# Altium PCB Copy of Motor Controller.PcbDoc (part 1 of 3)
Units mm, origin at the board's own origin, x right, y up, seen from the top; angles counter-clockwise.
Board outline 52 x 52 mm, 6 copper layers (Signal 1, GND1, Signal 2, Power, GND2, Signal 3), stack 1.816 mm thick; 182 components, 97 nets, 695 pads, 1437 vias.
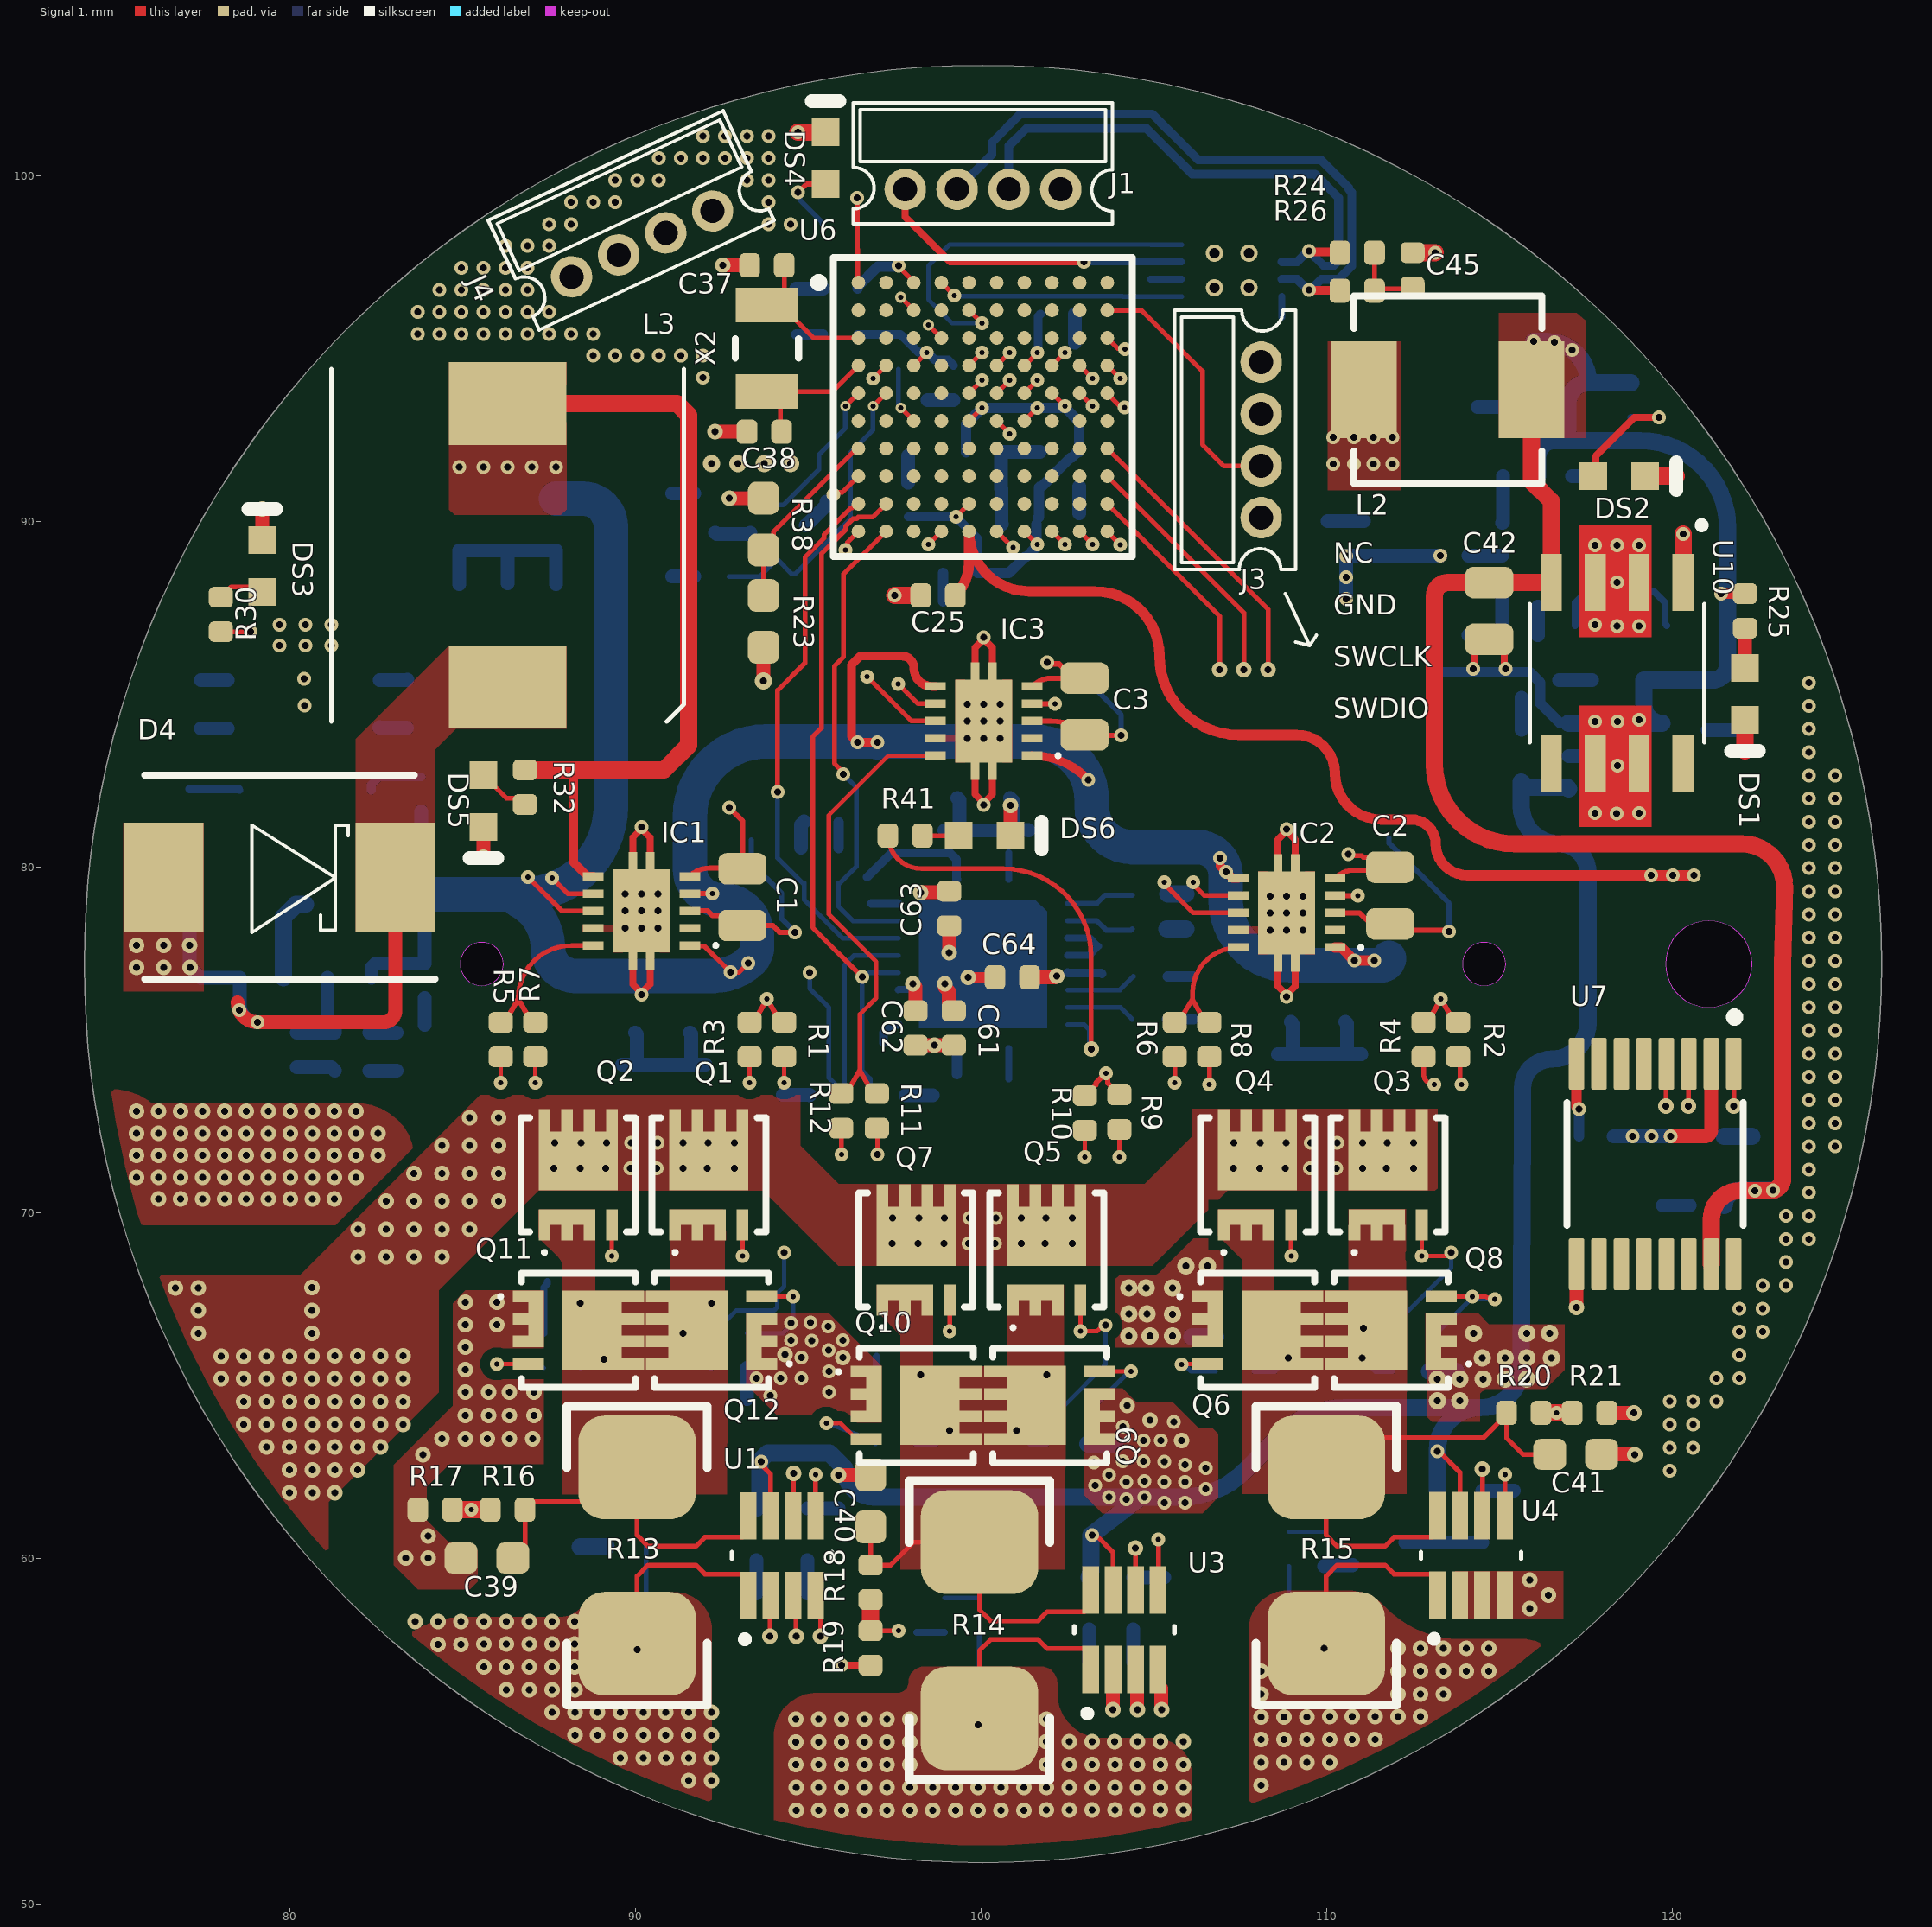
[diagram p0: Signal 1 view]
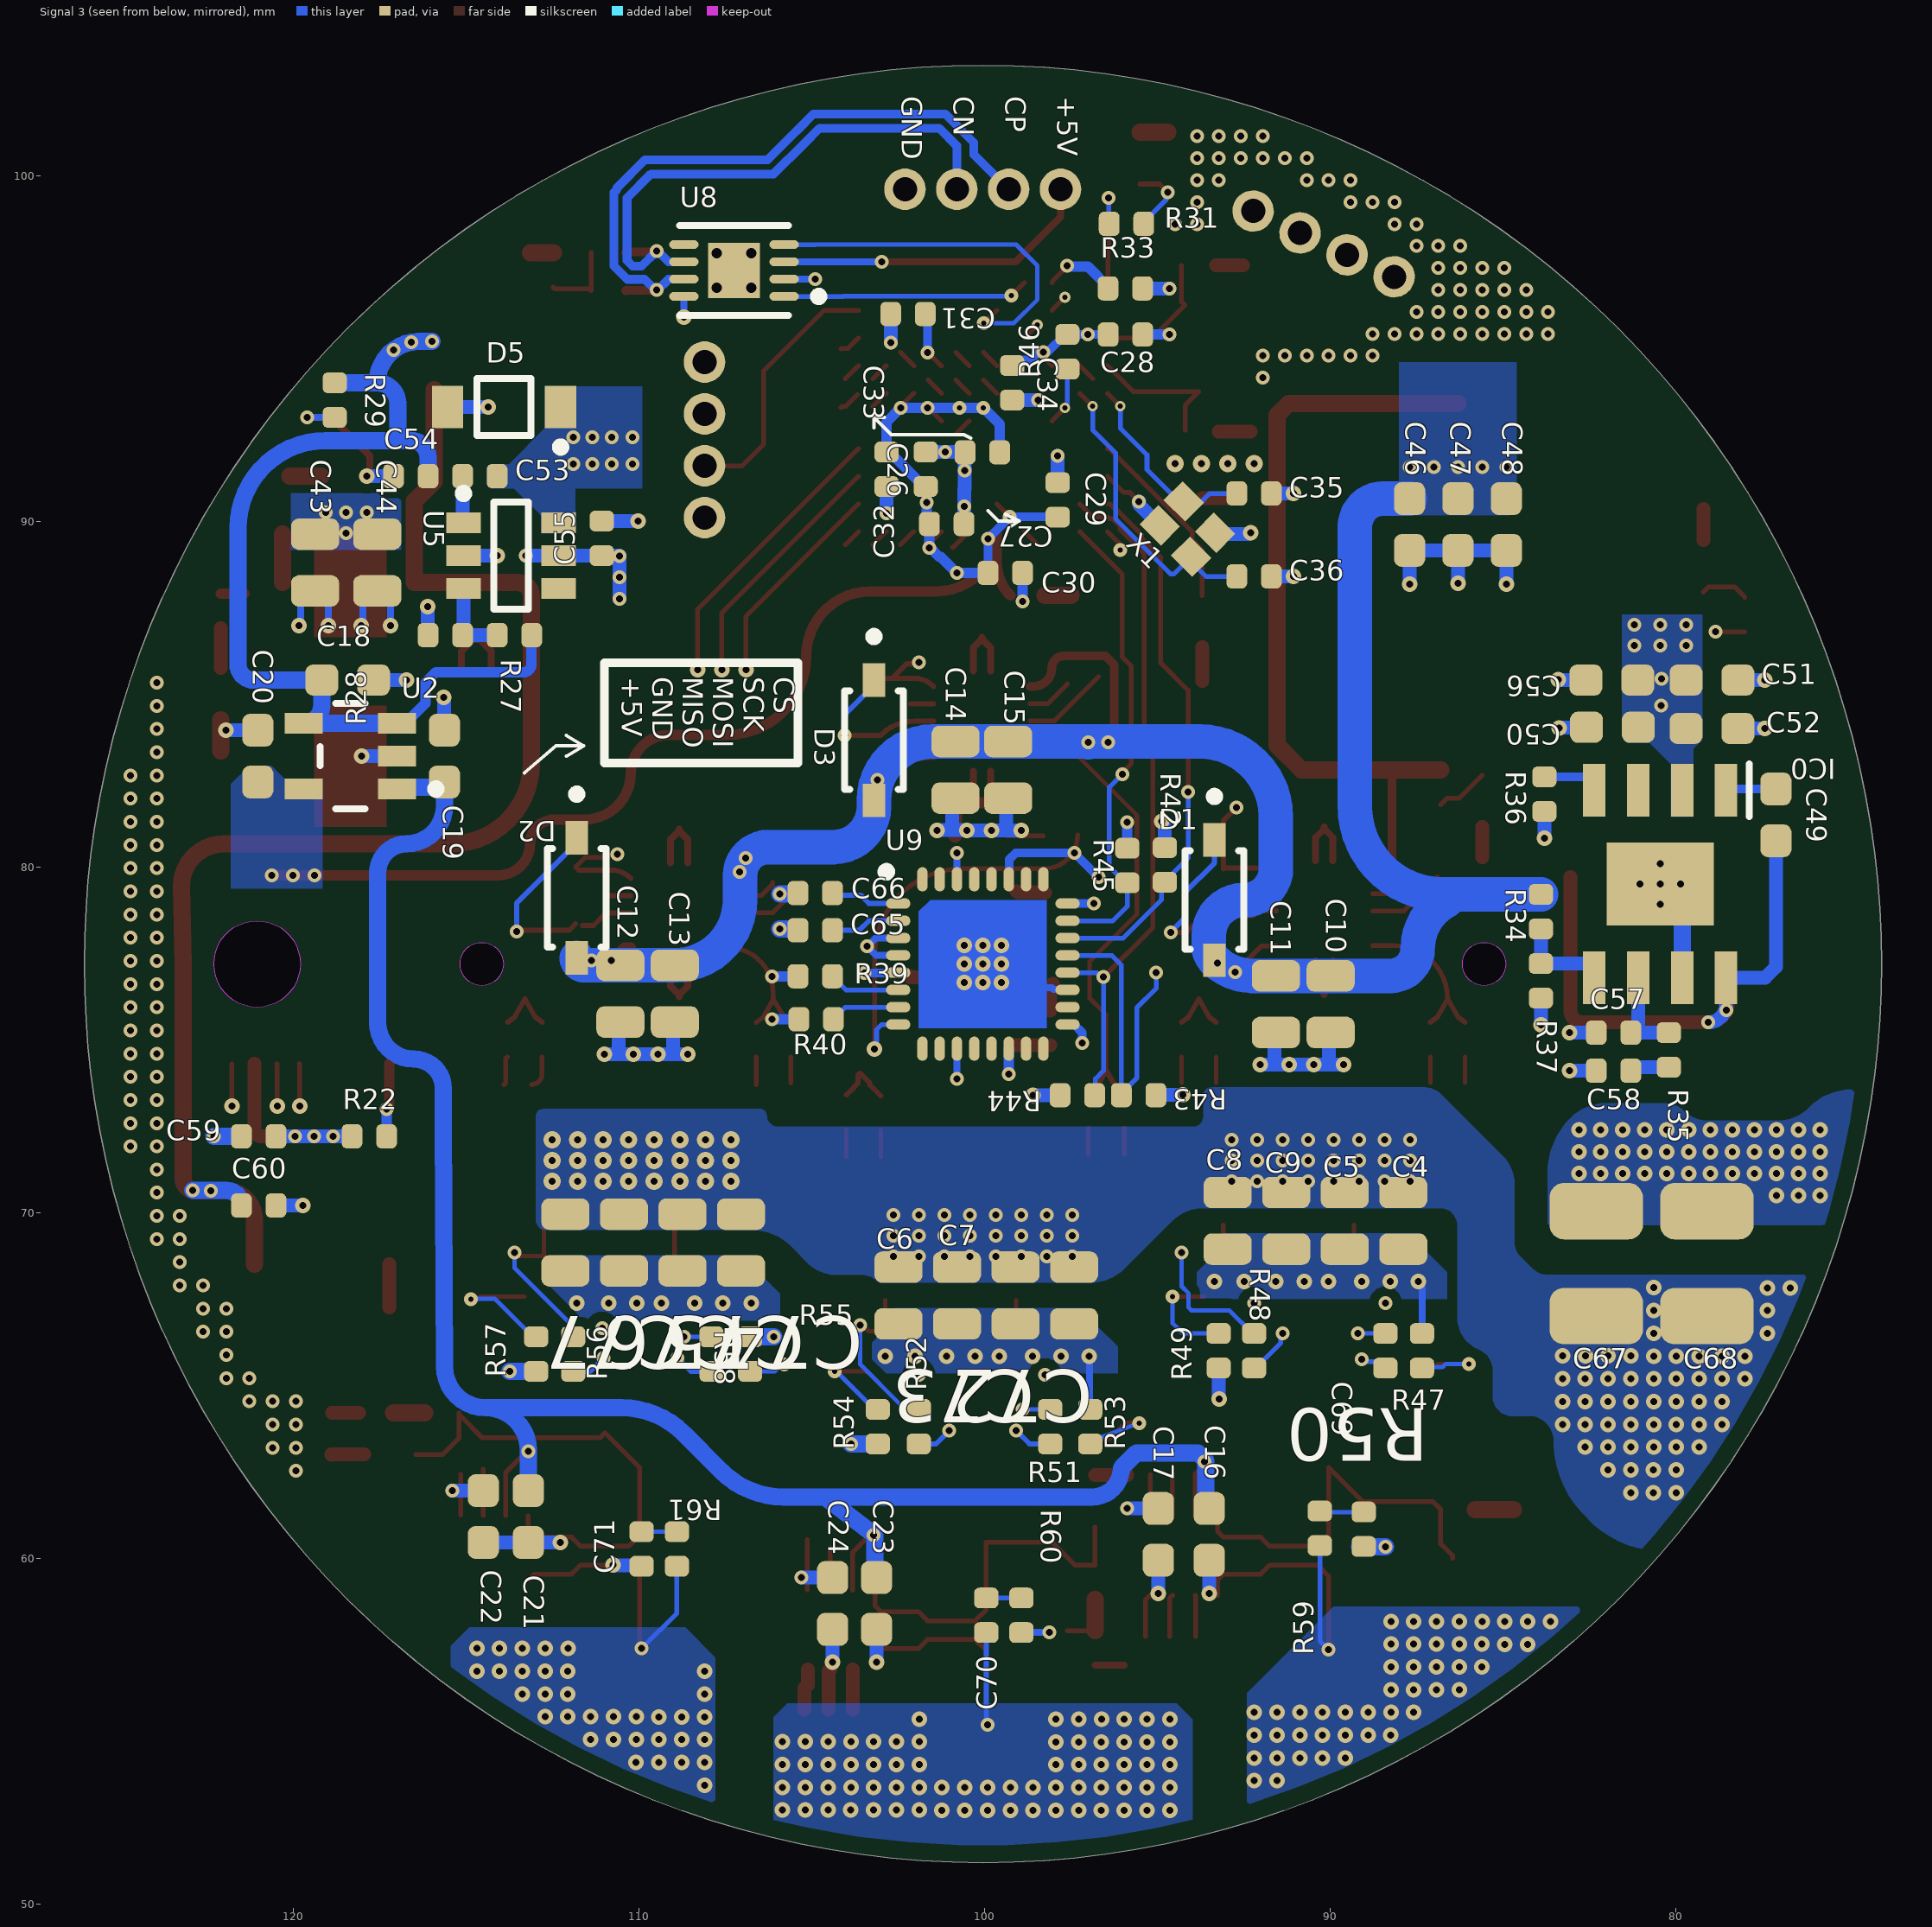
[diagram p1: Signal 3 view, seen from below]
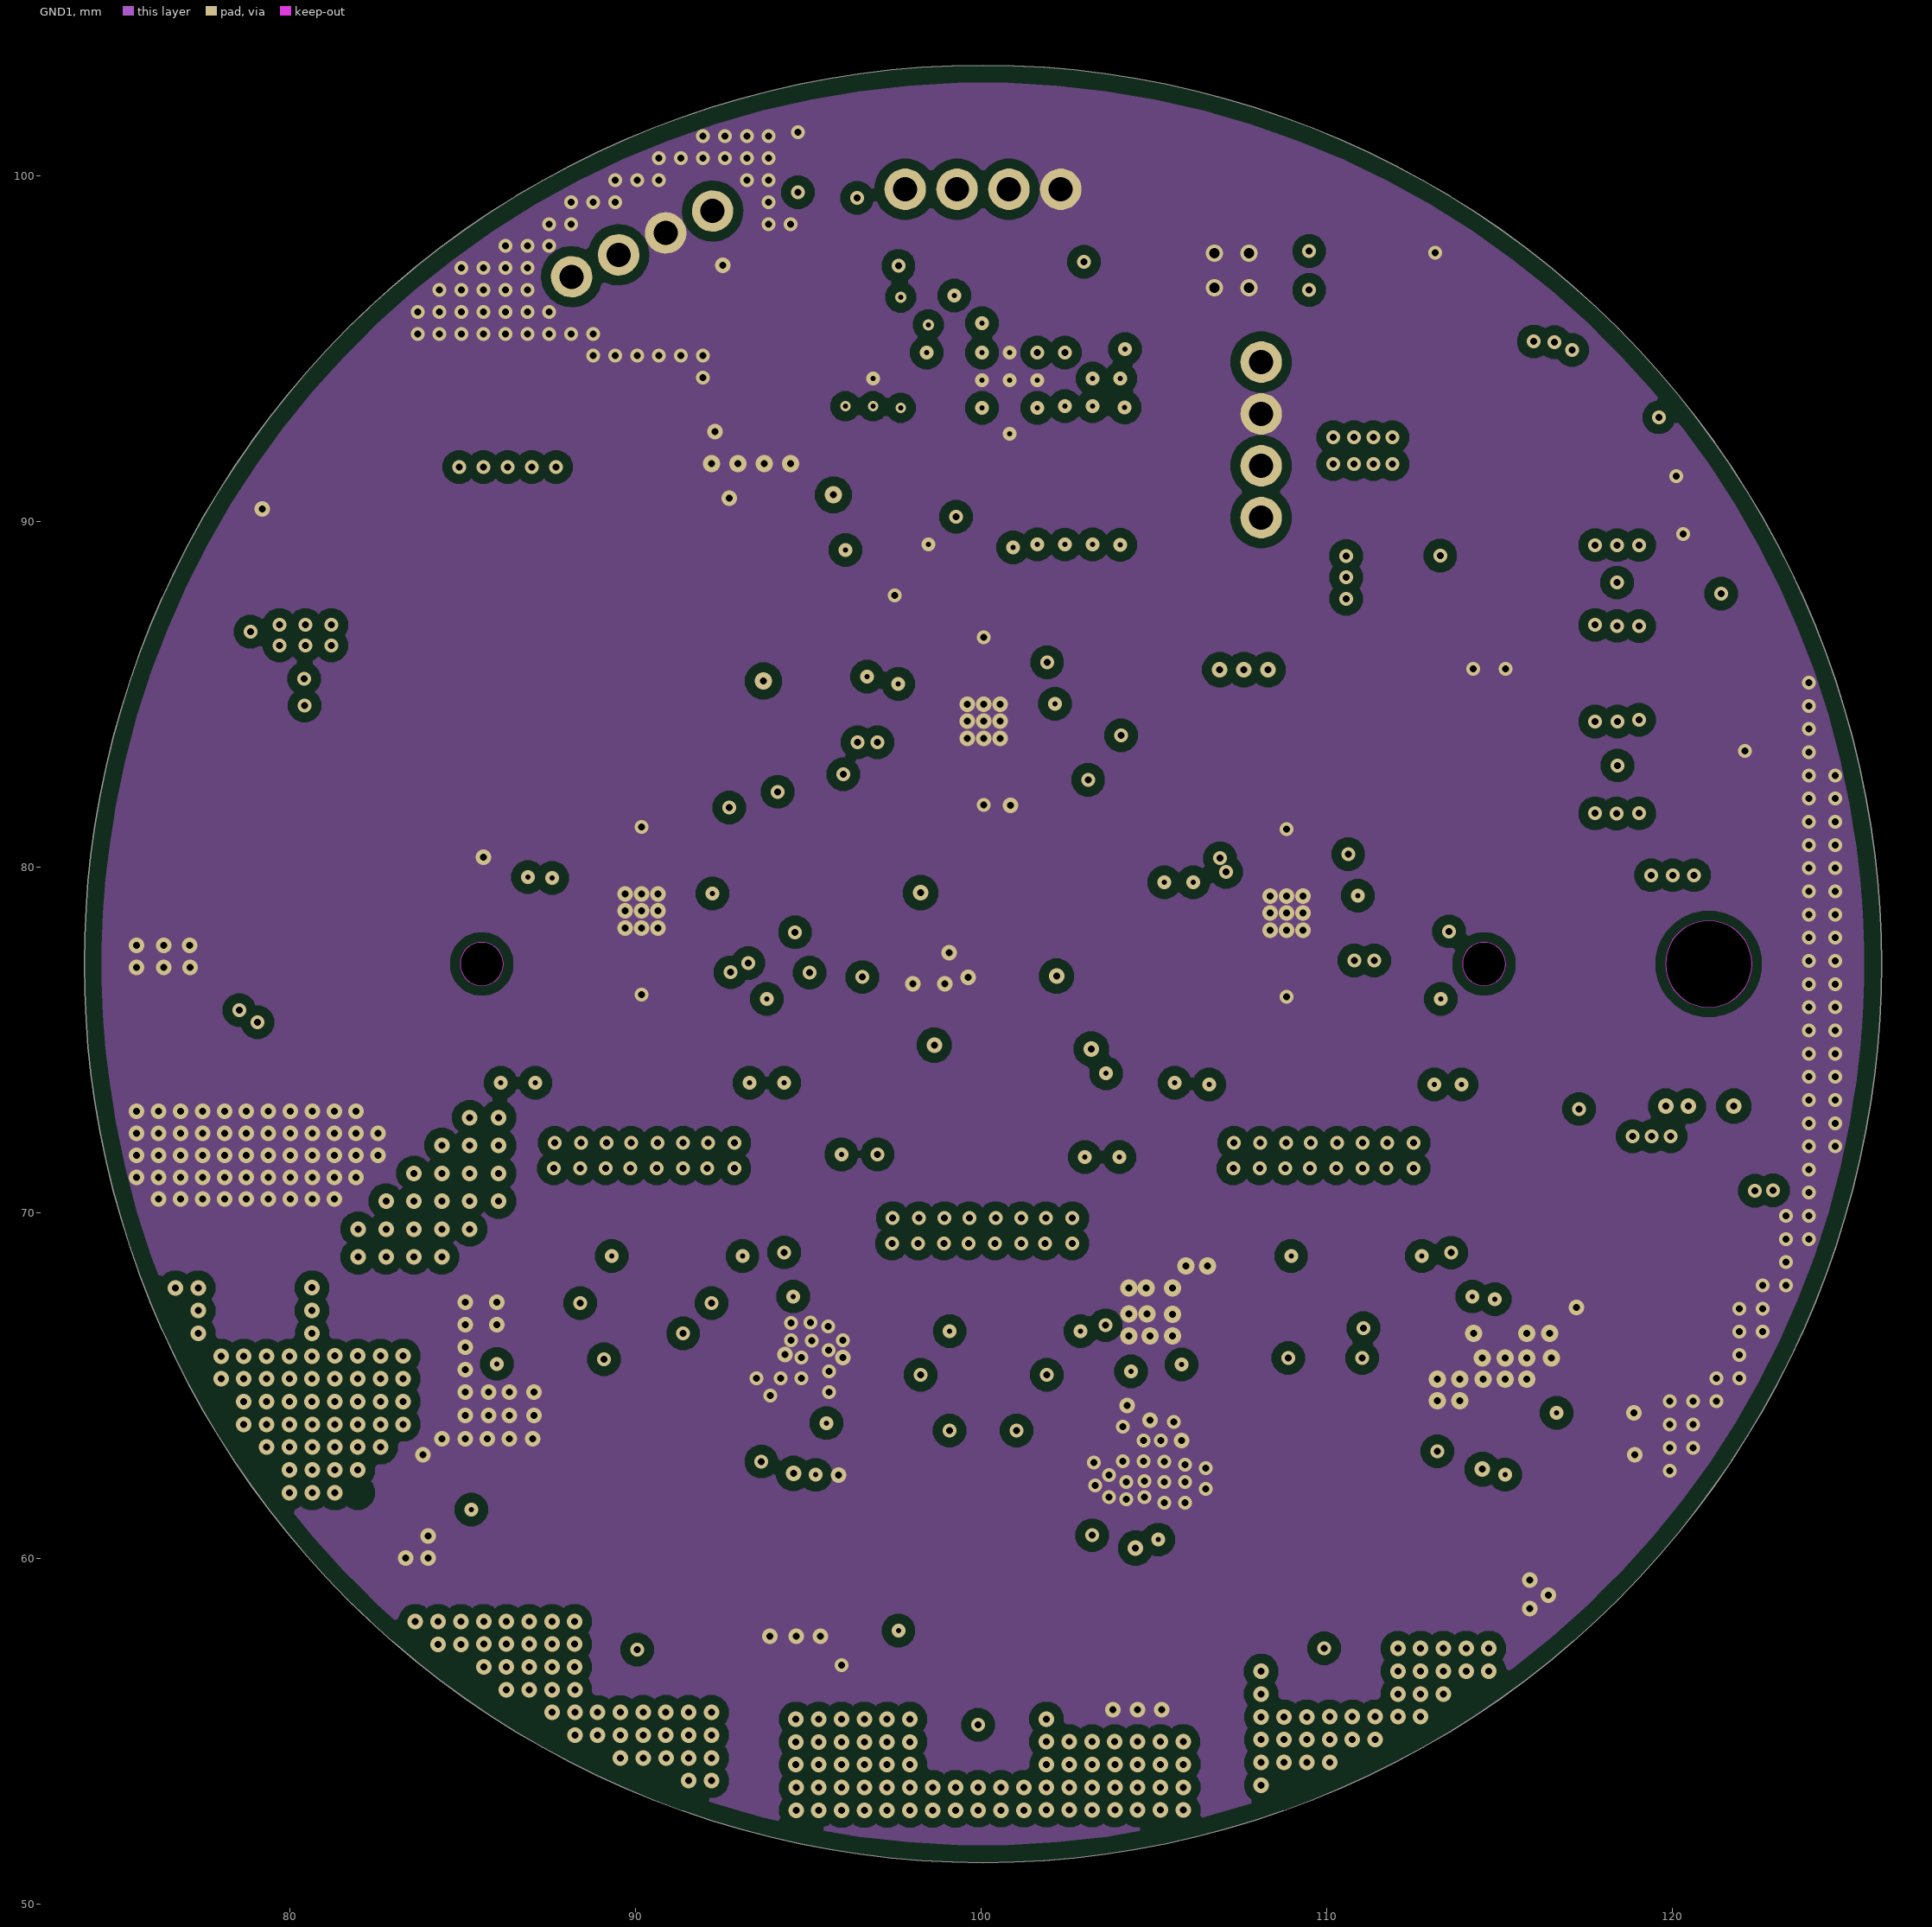
[diagram p2: GND1]
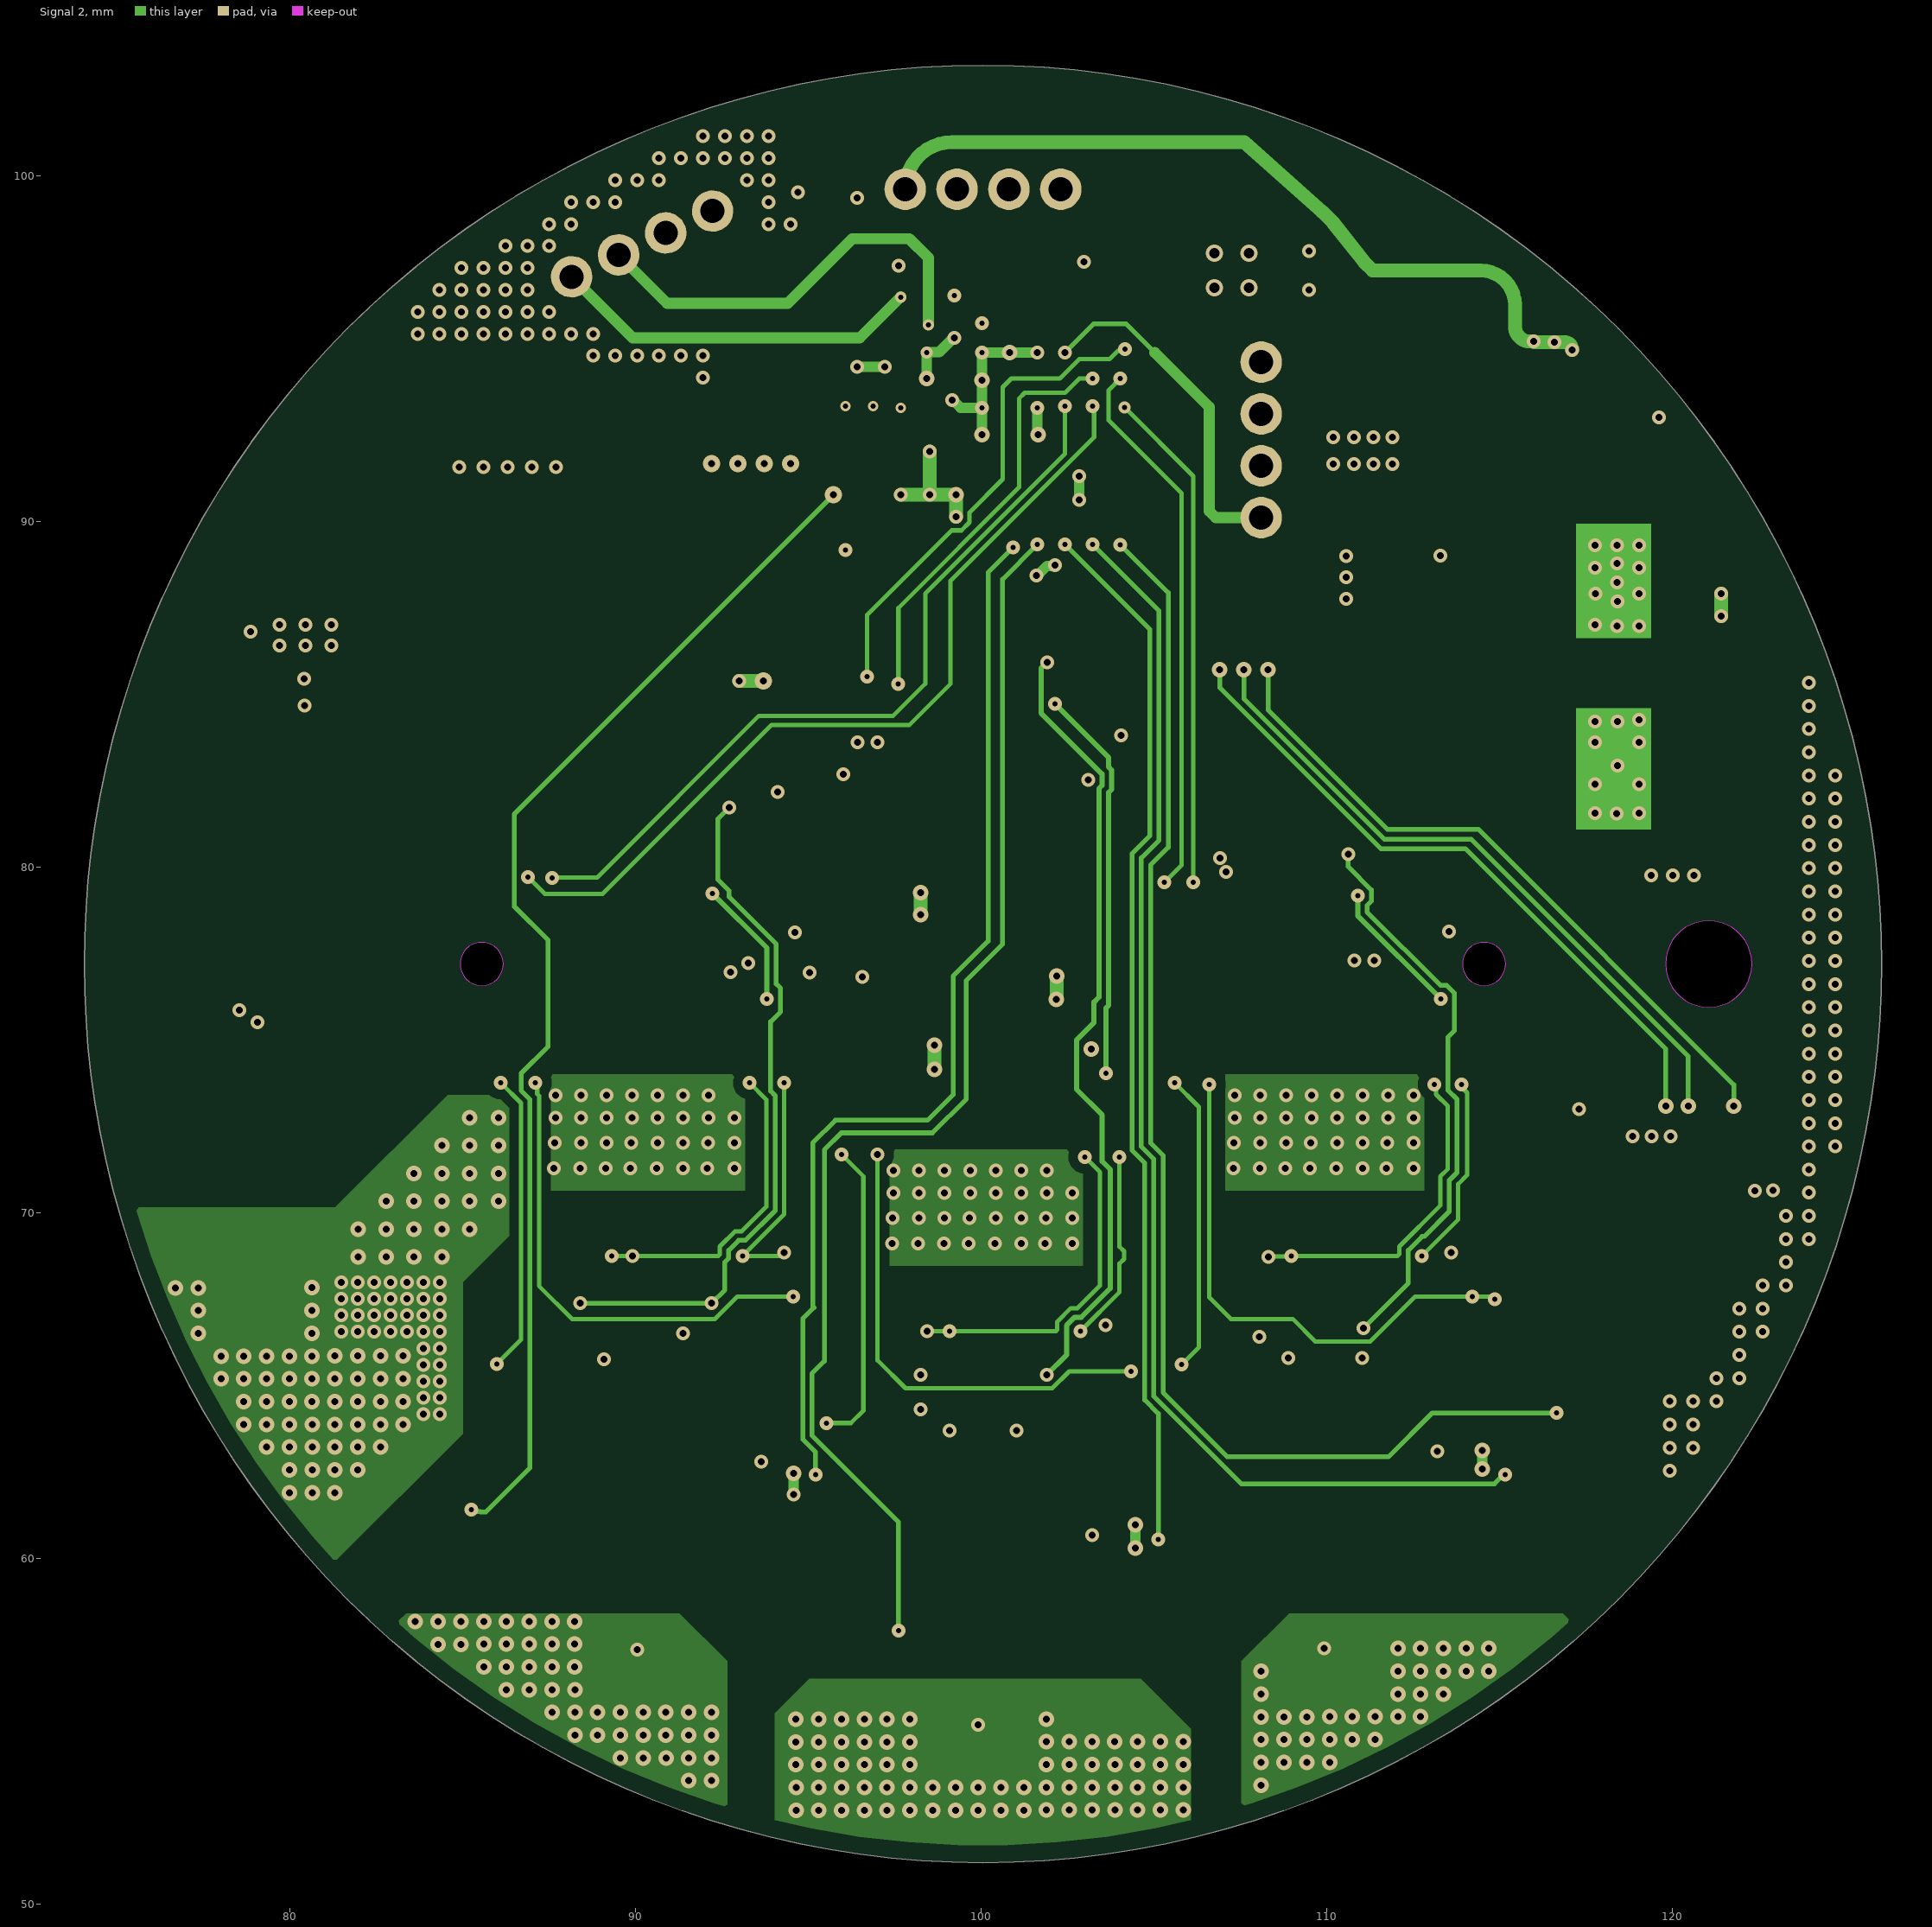
[diagram p3: Signal 2]
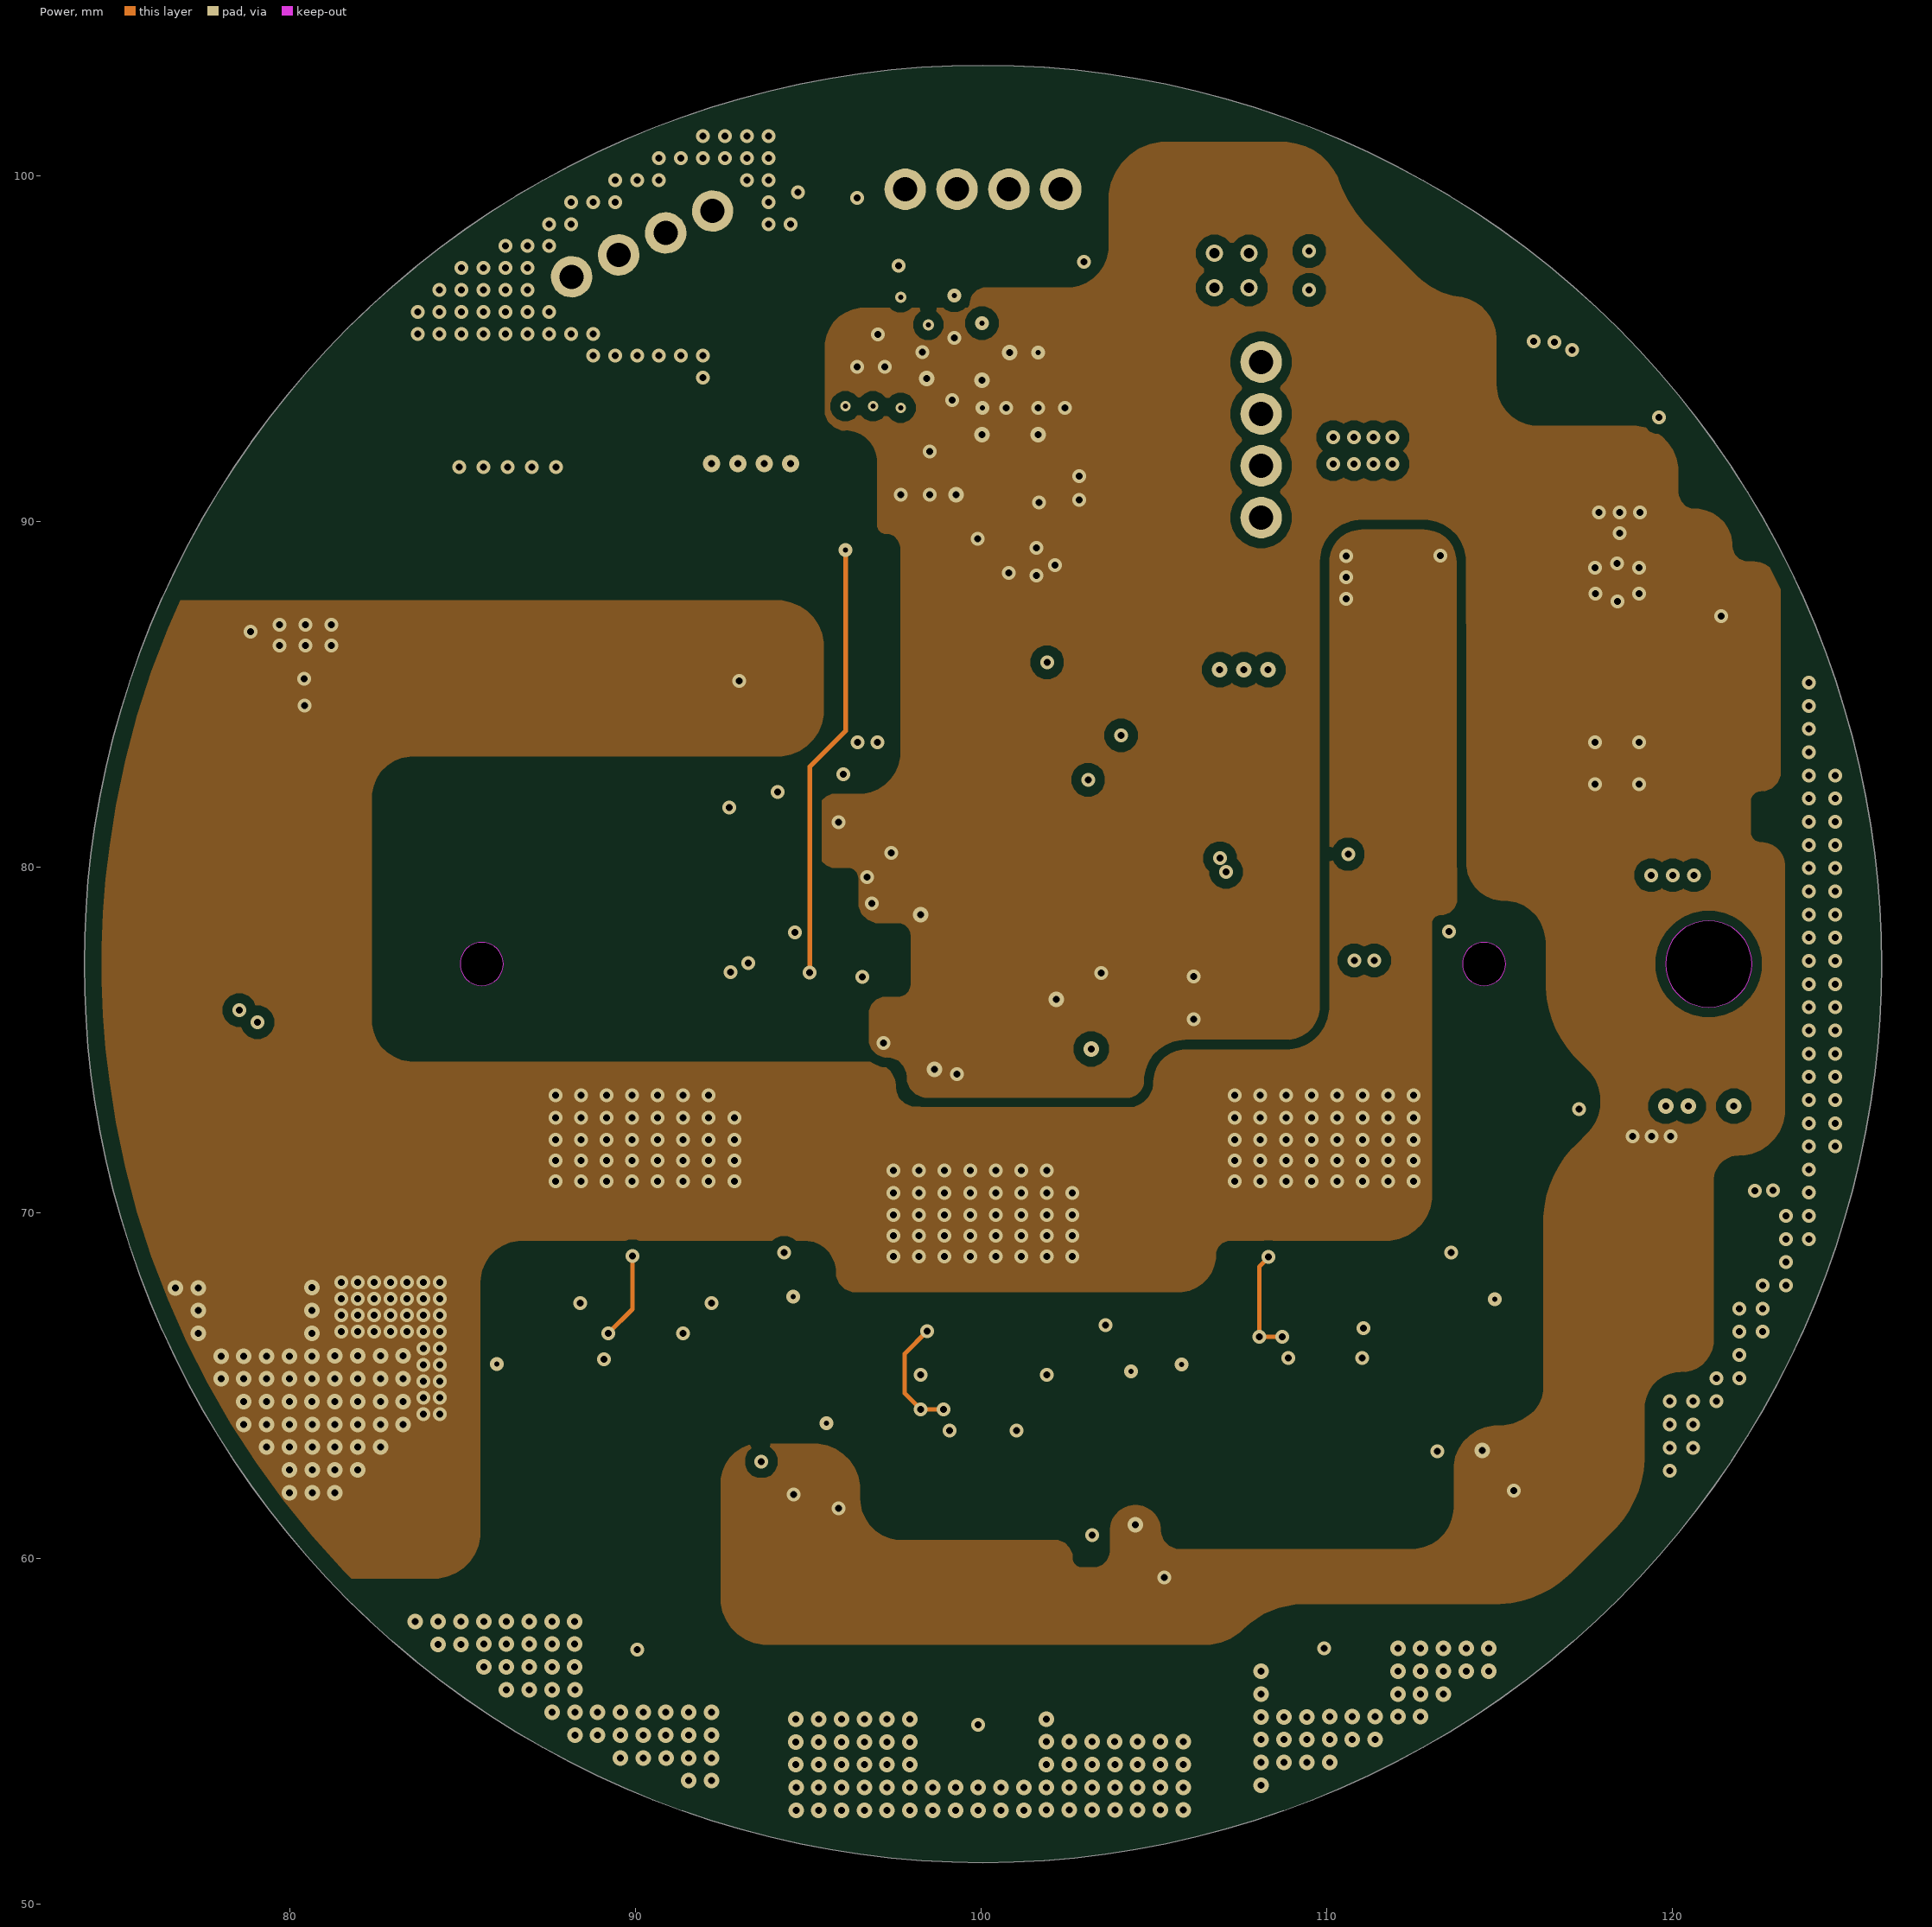
[diagram p4: Power]
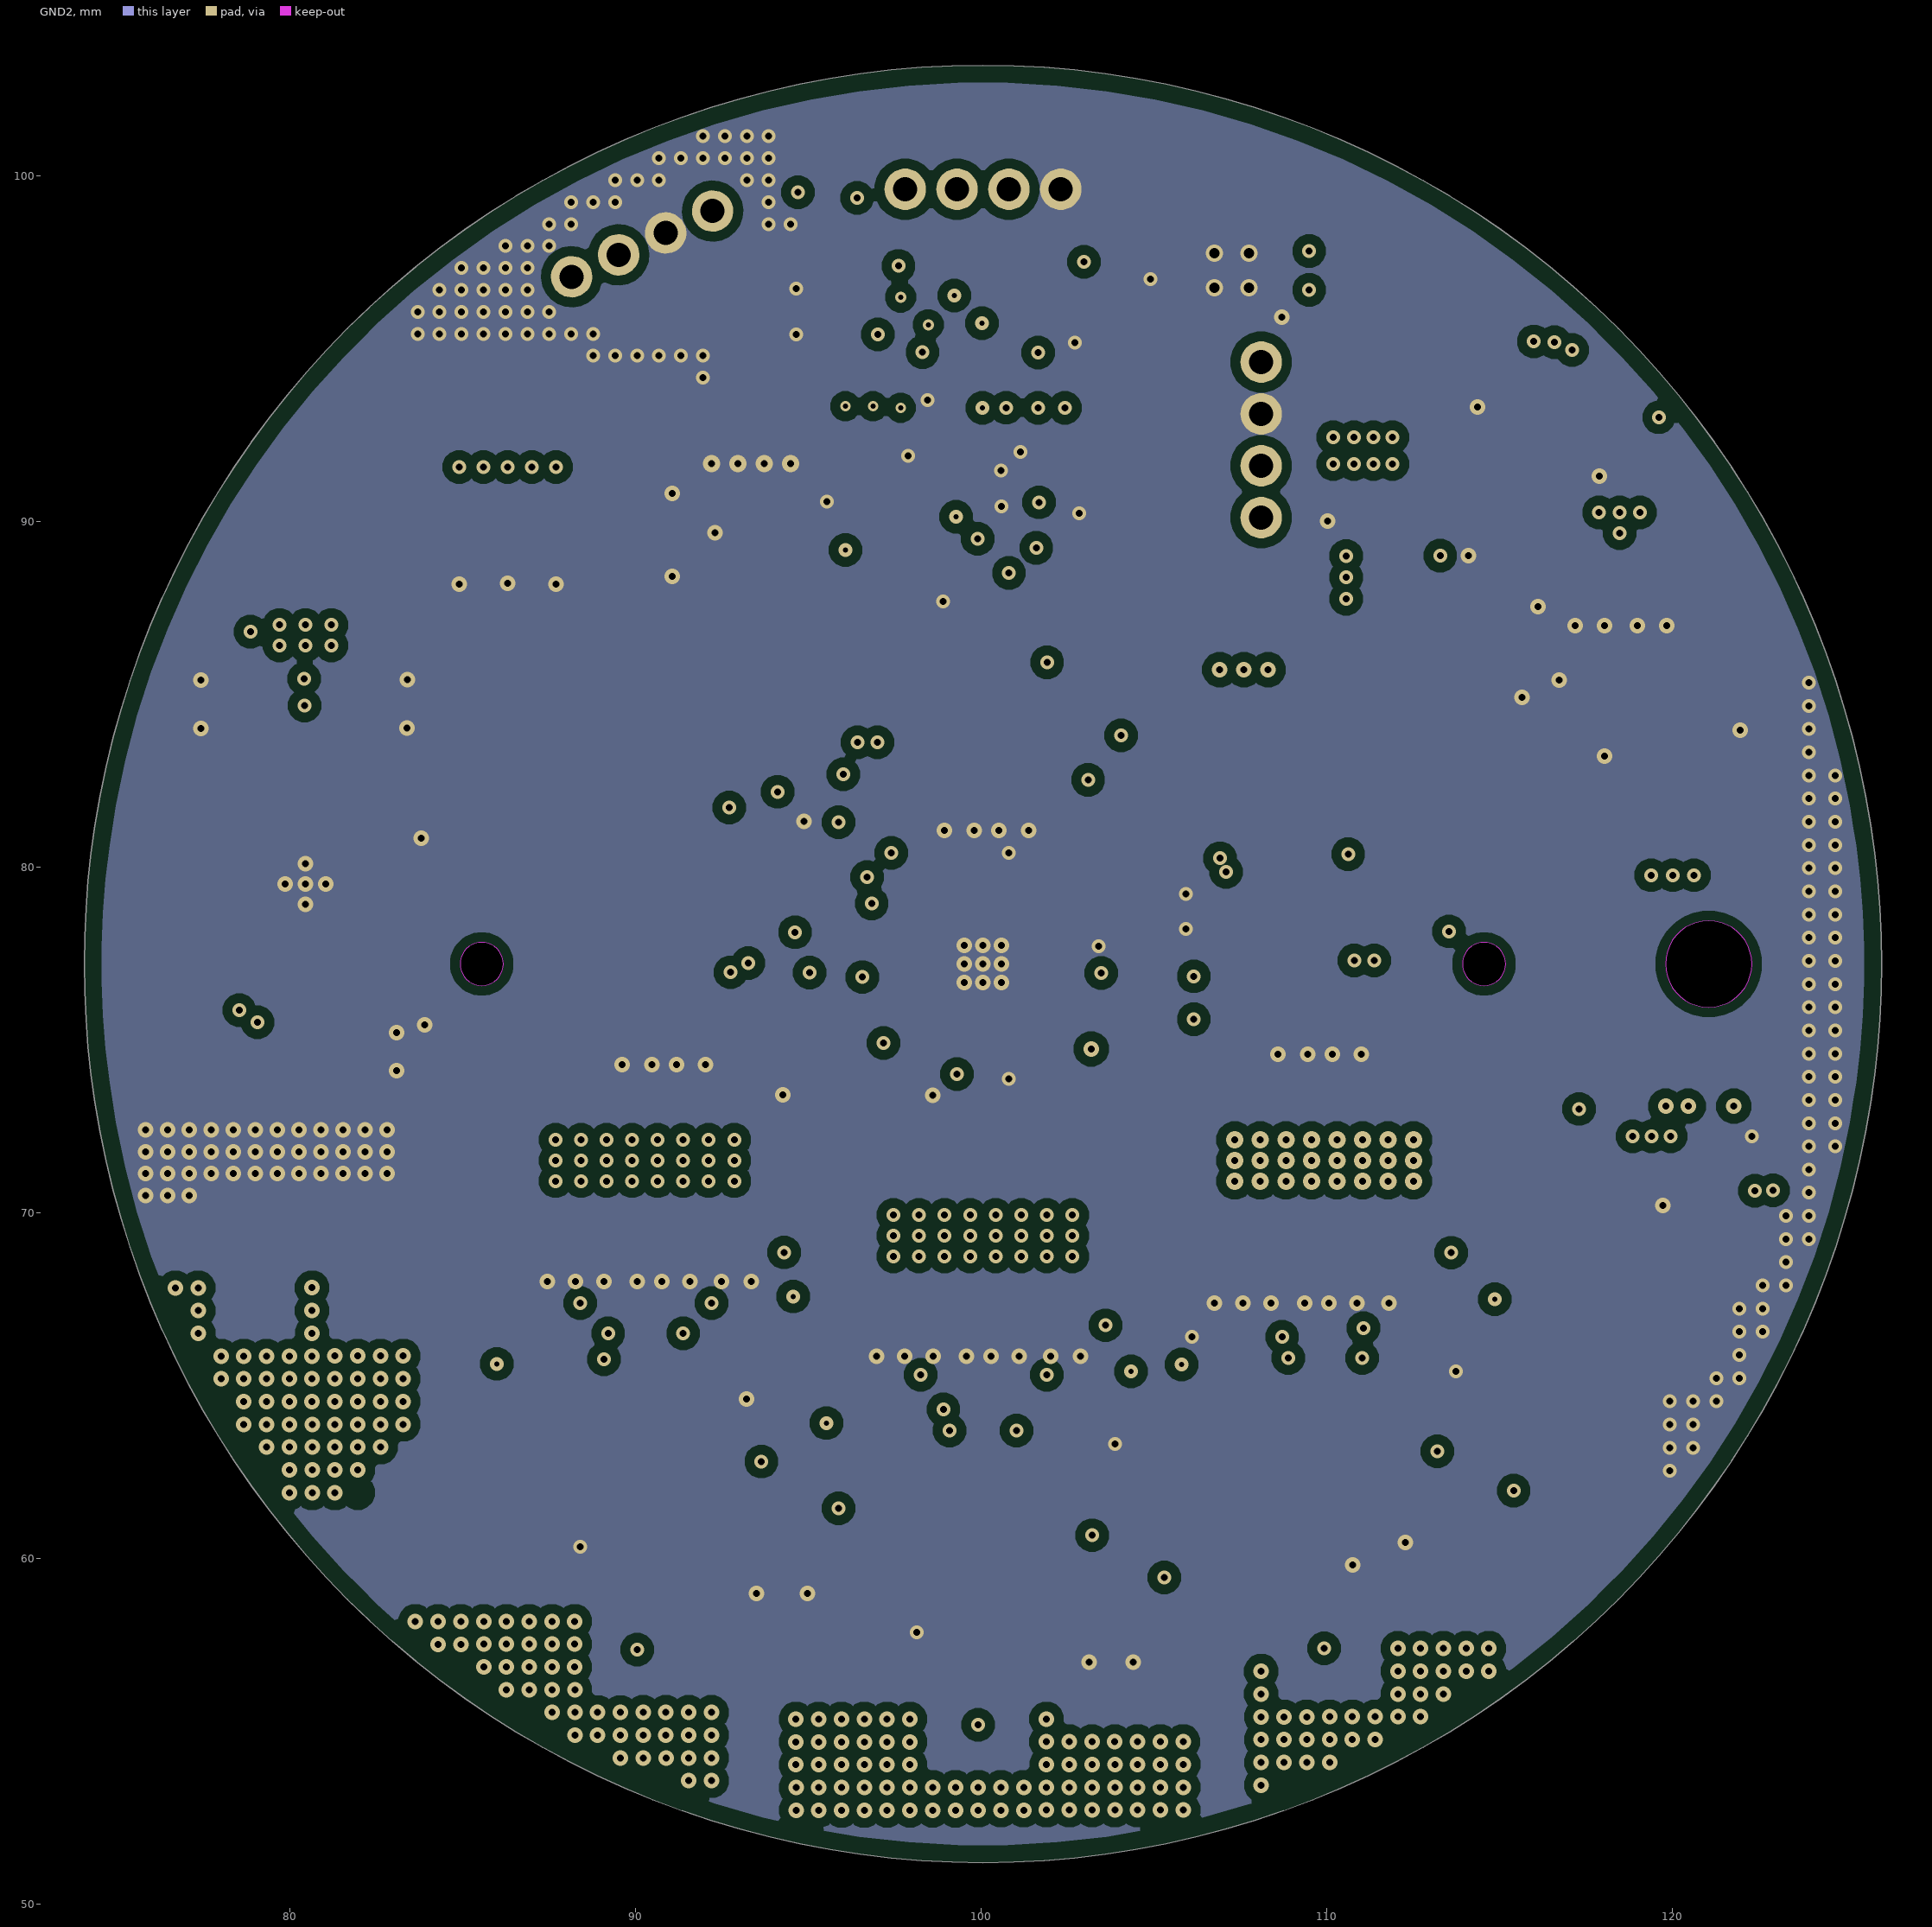
[diagram p5: GND2]

## Layer stack, top to bottom
Top Solder: solder mask 0.0102, Solder Resist, Dk 3.5
Signal 1: signal copper 0.035
Dielectric 1: prepreg 0.0994, PP-006, Dk 4.1
GND1: signal copper 0.035
Dielectric 2: prepreg 0.0711, PP-006, Dk 4.1
Signal 2: signal copper 0.035
Dielectric 3: core 1.265, FR-4, Dk 4.8
Power: signal copper 0.035
Dielectric 4: prepreg 0.0711, PP-006, Dk 4.1
GND2: signal copper 0.035
Dielectric 5: prepreg 0.0994, PP-006, Dk 4.1
Signal 3: signal copper 0.035
Bottom Solder: solder mask 0.0102, Solder Resist, Dk 3.5

## Board outline
74.357,73.187 cw(c100.047,77.187) 74.357,81.187 cw(c100.047,77.187) 81.663,95.572 cw(c100.047,77.187) 118.432,95.572 cw(c100.047,77.187) 125.738,81.187 cw(c100.047,77.187) 125.738,73.187 cw(c100.047,77.187) 118.432,58.803 cw(c100.047,77.187) 81.663,58.803 cw(c100.047,77.187)
cut-out: 85.547,76.562 ccw(c85.547,77.187) 86.172,77.187 ccw(c85.547,77.187) 85.547,77.812 ccw(c85.547,77.187) 84.922,77.187 ccw(c85.547,77.187)
cut-out: 121.047,75.937 ccw(c121.047,77.187) 122.297,77.187 ccw(c121.047,77.187) 121.047,78.437 ccw(c121.047,77.187) 119.797,77.187 ccw(c121.047,77.187)
cut-out: 114.547,76.562 ccw(c114.547,77.187) 115.172,77.187 ccw(c114.547,77.187) 114.547,77.812 ccw(c114.547,77.187) 113.922,77.187 ccw(c114.547,77.187)

## Design rules (kind name [scope] priority, off if disabled: settings)
BoardOutlineClearance [All] p1: gap=0.254 ignorepadtopadclearanceinfootprint=FALSE except(0: Arc-SplitContinuation Track-SplitContinuation SMDPad-SplitContinuation THPad-SplitContinuation Via-SplitContinuation Fill-SplitContinuation Poly-SplitContinuation Region-SplitContinuation Text-SplitContinuation; 0.1: Text-OutlineEdge; 0.5: Poly-OutlineEdge)
Clearance [All AND NOT InComponent('U6') AND NOT IsVia] p1: gap=0.2 ignorepadtopadclearanceinfootprint=TRUE except(0.1: Arc-SMDPad Track-SMDPad Text-Text; 0.127: Arc-Arc Arc-Track Arc-Via Arc-Text Track-Track Track-Via Track-Text SMDPad-Text THPad-Text Via-Text Fill-Text Poly-Text Region-Text; 0.15: SMDPad-SMDPad; 0.3: THPad-THPad THPad-Hole Via-Hole Fill-Hole Poly-Hole Region-Hole; 0.5: Text-Hole)
Clearance BGA [InComponent('U6') vs IsVia] p2: gap=0.2 ignorepadtopadclearanceinfootprint=TRUE except(0.1: Arc-Via Track-Via SMDPad-Via THPad-Via Via-Via; 0.127: Arc-Text Track-Text SMDPad-Text THPad-Text Via-Text Fill-Text Poly-Text Region-Text Text-Text; 0.15: Arc-SMDPad Track-SMDPad SMDPad-SMDPad; 0.16: Arc-Arc Arc-Track Track-Track; 0.3: THPad-THPad THPad-Hole Via-Hole Fill-Hole Poly-Hole Region-Hole; 0.5: Text-Hole)
Creepage Creepage_1 [All] p1: checkdistance=0.254 applytopolygonpour=TRUE
Creepage Creepage_2 [InNet('+5V') vs InNet('VIN')] p2: checkdistance=0.3 applytopolygonpour=TRUE
Creepage [InNet('GND') vs InNet('VOUT')] p3: checkdistance=1 applytopolygonpour=TRUE
DiffPairsRouting Ethernet [InNetClass('CM4_ETH') OR InNetClass('ETHERNET') OR InNetClass('SWITCH_ETH') OR InDifferentialPair('R3A') OR InDifferentialPair('R3B') OR InDifferentialPair('LXRX') OR InDifferentialPair('LXTX')] p1: maxlimit=1 minlimit=0.2 mostfreqgap=0.2 toplayer_maxgap=0.4 toplayer_minwidth=0.111 toplayer_maxwidth=0.381 toplayer_prefwidth=0.111 midlayer1_maxgap=0.4 midlayer1_minwidth=0.158 midlayer1_maxwidth=0.381 midlayer1_prefwidth=0.158 midlayer2_minwidth=0.127 midlayer2_maxwidth=0.381 midlayer2_prefwidth=0.161 midlayer3_minwidth=0.127 midlayer3_maxwidth=0.381 midlayer3_prefwidth=0.161 midlayer4_minwidth=0.116 midlayer4_maxwidth=0.381 midlayer4_prefwidth=0.161 bottomlayer_maxgap=0.4 bottomlayer_minwidth=0.111 bottomlayer_maxwidth=0.381 bottomlayer_prefwidth=0.111 maxuncoupledlength=12.7
DiffPairsRouting USB [InNetClass('USB')] p2: maxlimit=1 minlimit=0.2 mostfreqgap=0.2 toplayer_minwidth=0.111 toplayer_maxwidth=0.381 toplayer_prefwidth=0.139 midlayer1_minwidth=0.158 midlayer1_maxwidth=0.381 midlayer1_prefwidth=0.217 midlayer2_minwidth=0.127 midlayer2_maxwidth=0.381 midlayer2_prefwidth=0.161 midlayer3_minwidth=0.127 midlayer3_maxwidth=0.381 midlayer3_prefwidth=0.161 midlayer4_minwidth=0.116 midlayer4_maxwidth=0.381 midlayer4_prefwidth=0.161 bottomlayer_minwidth=0.111 bottomlayer_maxwidth=0.381 bottomlayer_prefwidth=0.139 maxuncoupledlength=12.7
HoleToHoleClearance [All] p1: gap=0.21 allowstackedmicrovias=TRUE
MinimumAnnularRing MicroVias [IsMicroVia] p1: minimumring=0.1
MinimumSolderMaskSliver [All] p1: minsoldermaskwidth=0.09
PlaneClearance [All] p1: clearance=0.254
PlaneConnect [All] p1: planeconnectstyle=Direct reliefexpansion=0.508 reliefentries=4 reliefconductorwidth=0.254 reliefairgap=0.254
PolygonConnect [All] p1: connectstyle=Direct reliefconductorwidth=0.254 reliefentries=4 polygonreliefangle="90 Angle" airgapwidth=0.254
ReturnPath [All] p1: impedanceprofileid={1191D015-BF16-4530-92F9-918470D49468} _gaplimit=0
RoutingVias BurriedVia [IsBuriedVia] p1: holewidth=0.2 width=0.4 viastyle="Through Hole" minholewidth=0.2 minwidth=0.4 maxholewidth=0.711 maxwidth=1.27
RoutingVias [IsThruVia] p2: holewidth=0.2 width=0.5 viastyle="Through Hole" minholewidth=0.2 minwidth=0.3 maxholewidth=2.5 maxwidth=3
RoutingVias RoutingMicroVia [IsMicroVia] p3: holewidth=0.15 width=0.4 viastyle="Through Hole" minholewidth=0.15 minwidth=0.3 maxholewidth=2.5 maxwidth=3
SilkToSolderMaskClearance [IsPad] p1: minsilkscreentomaskgap=0.065 clearancetoexposedcopper=TRUE
SolderMaskExpansion [All] p1: expansion=0.102 istentingtop=FALSE
SupplyNets "Schematic Supply Nets_13" [InNet('+1.65V')] p1: voltage=0.000
SupplyNets "Schematic Supply Nets_12" [InNet('VDDA')] p2: voltage=0.000
SupplyNets "Schematic Supply Nets_10" [InNet('+12V')] p3: voltage=0.000
SupplyNets "Schematic Supply Nets_8" [InNet('VCC')] p4: voltage=0.000
SupplyNets "Schematic Supply Nets_6" [InNet('GND')] p5: voltage=0.000
SupplyNets "Schematic Supply Nets_5" [InNet('+3.3V')] p6: voltage=0.000
SupplyNets "Schematic Supply Nets_4" [InNet('+5V')] p7: voltage=0.000
Width [Not InDifferentialPairClass('All Differential Pairs')] p1: maxlimit=10 minlimit=0.1 preferedwidth=0.127 minimp=50.000000 maximp=50.000000 favimp=50.000000
24 further rules are at their usual default settings.

## Classes and differential pairs
component class Encoder: C61 C62 C63 C64 C65 C66 DS6 R39 R40 R41 R42 R43 R44 R45 U9
component class "Buck Converters": C46 C47 C48 C49 C50 C51 C52 C56 C57 C58 C74 C75 D4 IC0 L3 R34 R35 R36 R37
component class stm32f407: C25 C26 C27 C28 C29 C30 C31 C32 C33 C34 C35 C36 C37 C38 C42 C43 C44 C45 C53 C54 C55 C59 C60 D5 DS1 DS2 DS3 DS4 DS5 J1 J3 J4 L2 R22 R23 R24 R25 R26 R27 R28 R29 R30 R31 R32 R33 R38 R46 U5 U6 U7 U8 U10 X1 X2
component class Inverter: C1 C2 C3 C4 C5 C6 C7 C8 C9 C10 C11 C12 C13 C14 C15 C16 C17 C18 C19 C20 C21 C22 C23 C24 C39 C40 C41 C67 C68 C69 C70 C71 C72 C73 C74 C75 C76 C77 D1 D2 D3 IC1 IC2 IC3 Q1 Q2 Q3 Q4 Q5 Q6 Q7 Q8 Q9 Q10 Q11 Q12 R1 R2 R3 R4 R5 R6 R7 R8 R9 R10 R11 R12 R13 R14 R15 R16 R17 R18 R19 R20 R21 R47 R48 R49 R50 R51 R52 R53 R54 R55 R56 R57 R58 R59 R60 R61 U1 U2 U3 U4
differential pair CAN: +CAN_P -CAN_N

## Components (designator, comment, footprint, x,y, rotation, side; value= is the part's Value field where it differs from the comment)
C1 "470nF, 25V" C_0805 93.091,79.121 r270 top
C2 "470nF, 25V" C_0805 111.835,79.166 r270 top
C3 "470nF, 25V" C_0805 102.988,84.636 r270 top
C4 "4.7uF" C_0805 87.884,69.755 r270 bottom
C5 "4.7uF" C_0805 89.577,69.755 r270 bottom
C6 "4.7uF" C_0805 102.489,67.596 r270 bottom
C7 "4.7uF" C_0805 100.796,67.596 r270 bottom
C8 "4.7uF" C_0805 92.964,69.755 r270 bottom
C9 "4.7uF" C_0805 91.271,69.755 r270 bottom
C10 "100nF, 100V" C_0805 89.986,76.024 r270 bottom
C11 "4.7uF, 100V" C_0805 91.567,76.024 r270 bottom
C12 "100nF, 100V" C_0805 110.535,76.327 r270 bottom
C13 "4.7uF, 100V" C_0805 108.96,76.327 r270 bottom
C14 "100nF, 100V" C_0805 100.838,82.804 r270 bottom
C15 "4.7uF, 100V" C_0805 99.314,82.804 r270 bottom
C16 "100nF" C_0603 93.499,60.685 r270 bottom
C17 "100nF" C_0603 94.969,60.685 r270 bottom
C18 "100nF" C_0603 118.425,85.4 r180 bottom
C19 "100nF" C_0603 115.625,83.2 r90 bottom
C20 "100nF" C_0603 121.025,83.2 r90 bottom
C21 "100nF" C_0603 113.198,61.201 r270 bottom
C22 "100nF" C_0603 114.5,61.2 r270 bottom
C23 "100nF" C_0603 103.124,58.686 r270 bottom
C24 "100nF" C_0603 104.394,58.686 r270 bottom
C25 "1uF" C_0402 98.753,87.85 r180 top
C26 "1uF" C_0402 101.7,91.5 r90 bottom
C27 "100nF" C_0402 101.092,89.916 r0 bottom
C28 "1uF" C_0402 95.922,95.399 r0 bottom
C29 "1uF" C_0402 97.883,90.614 r90 bottom
C30 "100nF" C_0402 99.4,88.5 r0 bottom
C31 "100nF" C_0402 102.215,95.992 r0 bottom
C32 "100nF" C_0402 102.833,91.5 r270 bottom
C33 "100nF" C_0402 100.061,91.99 r0 bottom
C34 "100nF" C_0402 99.2,94 r270 bottom
C35 "12pF" C_0402 92.2,90.8 r180 bottom
C36 "12pF" C_0402 92.2,88.4 r0 bottom
C37 "2pF" C_0402 93.8,97.4 r180 top
C38 "2pF" C_0402 93.726,92.583 r0 top
C39 "100nF" C_0603 85.7,60 r180 top
C40 "100nF" C_0603 96.8,61.65 r90 top
C41 "100nF" C_0603 117.2,63 r0 top
C42 "10uF" C_0805 114.7,87.4 r270 top
C43 "10uF" C_0805 119.369,88.8 r270 bottom
C44 "10uF" C_0805 117.569,88.8 r270 bottom
C45 "4.7nF" C_0402 112.479,97.265 r90 top
C46 "47uF" C_0603 87.7,89.9 r270 bottom
C47 "47uF" C_0603 86.3,89.9 r270 bottom
C48 "47uF" C_0603 84.9,89.9 r270 bottom
C49 "100nF" C_0603 77.1,81.5 r270 bottom
C50 "2.2uF" C_0603 81.831,84.036 r0 bottom
C51 "2.2uF" C_0603 78.95,85.4 r180 bottom
C52 "2.2uF" C_0603 78.95,84 r180 bottom
C53 "330nF" C_0402 114.6,91.3 r0 bottom
C54 "22uF" C_0402 116.6,91.3 r0 bottom
C55 "1uF" C_0402 111.072,89.5 r90 bottom
C56 "2.2uF" C_0603 81.85,85.4 r0 bottom
C57 "47pF" C_0402 81.8,75.2 r0 bottom
C58 "4.7nF" C_0402 81.8,74.1 r0 bottom
C59 "100nF" C_0402 121,72.2 r0 bottom
C60 "100nF" C_0402 121,70.2 r0 bottom
C61 "1uF" C_0402 99.207,75.333 r270 top
C62 "1uF" C_0402 98.1,75.333 r270 top
C63 "1uF" C_0402 99.076,78.789 r90 top
C64 "100nF" C_0402 100.9,76.8 r0 top
C65 "100nF" C_0402 104.898,78.162 r180 bottom
C66 "100nF" C_0402 104.898,79.237 r180 bottom
C67 "4.7uF 100V" C_1210 82.3,67 r90 bottom
C68 "4.7uF 100V" C_1210 79.1,67 r90 bottom
C69 "2.2nF" C_0402 89.027,60.833 r270 bottom
C70 "2.2nF" C_0402 98.933,58.345 r270 bottom
C71 "2.2nF" C_0402 109.919,60.262 r270 bottom
C72 "4.7uF" C_0805 97.409,67.596 r270 bottom
C73 "4.7uF" C_0805 99.102,67.596 r270 bottom
C74 "4.7uF" C_0805 107.046,69.128 r270 bottom
C75 "4.7uF" C_0805 108.74,69.128 r270 bottom
C76 "4.7uF" C_0805 110.433,69.128 r270 bottom
C77 "4.7uF" C_0805 112.126,69.128 r270 bottom
D1 "BAT46ZFILM" FP-SOD-123-MFG 93.345,79.032 r270 bottom value=10pF
D2 "BAT46ZFILM" FP-SOD-123-MFG 111.8,79.1 r270 bottom value=10pF
D3 "BAT46ZFILM" FP-SOD-123-MFG 103.2,83.66 r270 bottom value=10pF
D4 "SS56C-HF" DIOM7859X239N 79.7,79.7 r180 top
D5 "MBR1H100SFT3G" ONSC-SOD-123FL-2-498-01_V 113.9,93.3 r0 bottom
DS1 "Red" EVRL-0603-2_V 122.1,85 r270 top
DS2 "Red" EVRL-0603-2_V 118.454,91.304 r0 top
DS3 "Red" EVRL-0603-2_V 79.2,88.7 r90 top
DS4 "Red" EVRL-0603-2_V 95.5,100.5 r90 top
DS5 "Red" EVRL-0603-2_V 85.6,81.9 r270 top
DS6 "Red" EVRL-0603-2_V 100.1,80.9 r0 top
IC0 "TPS54560DDA" SOIC127P600X170-9N 80.45,79.5 r270 bottom
IC1 "UCC27289DRCR" TPS51200MDRCTEP 90.167,78.724 r180 top
IC2 "UCC27289DRCR" TPS51200MDRCTEP 108.835,78.666 r180 top
IC3 "UCC27289DRCR" TPS51200MDRCTEP 100.073,84.217 r180 top
J1 "JST 4 PIN 1.5" "JST 4 PIN 1.5" 100.1,101.1 r0 top
J3 "JST 4 PIN 1.5" "JST 4 PIN 1.5" 106.6,92.4 r90 top
J4 "JST 4 PIN 1.5" "JST 4 PIN 1.5" 89.6,99.4 r25 top
L2 "15uH" FP-IHLP-2020CZ-FP_1_905x2-MFG 113.5,93.8 r0 top
L3 "7447798720" 7447797360 86.3,89.3 r180 top
Q1 "BSZ075N08NS5ATMA1" BSZ0909LSATMA1 92.116,71.093 r0 top
Q2 "BSZ075N08NS5ATMA1" BSZ0909LSATMA1 88.336,71.093 r0 top
Q3 "BSZ075N08NS5ATMA1" BSZ0909LSATMA1 111.771,71.093 r0 top
Q4 "BSZ075N08NS5ATMA1" BSZ0909LSATMA1 107.991,71.093 r0 top
Q5 "BSZ075N08NS5ATMA1" BSZ0909LSATMA1 101.895,68.916 r0 top
Q6 "BSZ075N08NS5ATMA1" BSZ0909LSATMA1 107.996,66.593 r270 top
Q7 "BSZ075N08NS5ATMA1" BSZ0909LSATMA1 98.115,68.916 r0 top
Q8 "BSZ075N08NS5ATMA1" BSZ0909LSATMA1 111.857,66.593 r90 top
Q9 "BSZ075N08NS5ATMA1" BSZ0909LSATMA1 101.981,64.416 r90 top
Q10 "BSZ075N08NS5ATMA1" BSZ0909LSATMA1 98.12,64.416 r270 top
Q11 "BSZ075N08NS5ATMA1" BSZ0909LSATMA1 88.341,66.593 r270 top
Q12 "BSZ075N08NS5ATMA1" BSZ0909LSATMA1 92.202,66.593 r90 top
R1 "10" R_0402 94.3,75 r90 top
R2 "10" R_0402 113.8,75 r90 top
R3 "10" R_0402 93.3,75 r90 top
R4 "10" R_0402 112.8,75 r90 top
R5 "10" R_0402 86.1,75 r90 top
R6 "10" R_0402 105.6,75 r90 top
R7 "10" R_0402 87.1,75 r90 top
R8 "10" R_0402 106.6,75 r90 top
R9 "10" R_0402 104,72.9 r90 top
R10 "10" R_0402 103.001,72.879 r90 top
R11 "10" R_0402 96.983,72.935 r90 top
R12 "10" R_0402 95.951,72.933 r90 top
R13 "JER2512F2R001L" JER2512F2R001L 90.043,60.071 r90 top
R14 "JER2512F2R001L" JER2512F2R001L 99.949,57.912 r90 top
R15 "JER2512F2R001L" JER2512F2R001L 109.982,60.071 r90 top
R16 "100k" R_0402 86.3,61.4 r180 top
R17 "4.99k" R_0402 84.2,61.4 r180 top
R18 "100k" R_0402 96.8,59.3 r270 top
R19 "4.99k" R_0402 96.8,57.4 r270 top
R20 "100k" R_0402 115.7,64.2 r0 top
R21 "4.99k" R_0402 117.6,64.2 r0 top
R22 "2k" R_0402 117.8,72.2 r0 bottom
R23 "180k" R_0603 93.7,87.1 r270 top
R24 "60" R_0402 110.879,96.665 r0 top
R25 "1k" R_0402 122.1,87.4 r90 top
R26 "60" R_0402 110.879,97.765 r180 top
R27 "55.4k" R_0402 113.6,86.7 r0 bottom
R28 "20k" R_0402 115.6,86.7 r0 bottom
R29 "1k" R_0402 118.8,93.5 r90 bottom
R30 "10k" R_0402 78,87.3 r270 top
R31 "1k" R_0402 95.893,98.6 r0 bottom
R32 "2k" R_0402 86.8,82.3 r90 top
R33 "10k" R_0402 95.925,96.731 r0 bottom
R34 "143k" R_0402 83.9,78.7 r270 bottom
R35 "16.5k" R_0402 80.2,74.7 r270 bottom
R36 "243k" R_0402 83.8,82.1 r270 bottom
R37 "10.2k" R_0402 83.9,76.7 r270 bottom
R38 "10k" R_0603 93.702,89.915 r270 top
R39 "47k" R_0402 104.898,76.831 r180 bottom
R40 "10k" R_0402 104.869,75.587 r180 bottom
R41 "1k" R_0402 97.8,80.9 r180 top
R42 "10k" R_0402 94.782,80.054 r90 bottom
R43 "10k" R_0402 95.54,73.389 r180 bottom
R44 "10k" R_0402 97.315,73.389 r0 bottom
R45 "10k" R_0402 95.869,80.033 r270 bottom
R46 "10k" R_0402 97.6,94.9 r90 bottom
R47 "10k" R_0402 88.4,65.998 r90 bottom
R48 "10k" R_0402 92.2,65.998 r90 bottom
R49 "10k" R_0402 93.224,65.998 r90 bottom
R50 "10k" R_0402 87.341,65.998 r270 bottom
R51 "10k" R_0402 98.1,63.8 r90 bottom
R52 "10k" R_0402 101.9,63.8 r90 bottom
R53 "10k" R_0402 96.942,63.8 r270 bottom
R54 "10k" R_0402 103.089,63.8 r90 bottom
R55 "10k" R_0402 107.9,65.9 r90 bottom
R56 "10k" R_0402 111.9,65.9 r90 bottom
R57 "10k" R_0402 112.973,65.9 r90 bottom
R58 "10k" R_0402 106.783,65.9 r270 bottom
R59 "10" R_0402 90.297,60.858 r90 bottom
R60 "10" R_0402 99.949,58.345 r90 bottom
R61 "10" R_0402 108.899,60.262 r90 bottom
U1 "INA241A3IDDFR" SOT65P280X110-8N 94.234,60.071 r90 top
U2 "REF2033AIDDCR" FP-DDC0005A-MFG 118.35,83.2 r0 bottom
U3 "INA241A3IDDFR" SOT65P280X110-8N 104.14,57.924 r90 top
U4 "INA241A3IDDFR" SOT65P280X110-8N 114.173,60.079 r90 top
U5 "LMR16006XDDC" SOT95P280X110-6N 113.7,89 r180 bottom
U6 "STM32G474VEH6" FP-TFBGA100-A08Q-MFG 100.047,93.3 r0 top
U7 "TXB0106PWR" Texas_Instruments_PW0016A_MFG 119.5,71.4 r270 top
U8 "MCP2544WFDT-H/MNY" FP-C04-129-MNY-MFG 107.25,97.25 r0 bottom
U9 "iC-TW39" iC-TW39 100.047,77.187 r180 bottom
U10 "MC33269D-3.3G" *SOIC127P600X175-8N 118.4,85.6 r270 top
X1 "24MHz" "24MHz Crystal" 94.127,89.768 r225 bottom
X2 "Crystal 32K" "Crystal 32k" 93.8,95 r90 top

## Footprints (in the part's own frame and the unit in brackets; to place one, negate y for a bottom-side part, rotate by r counter-clockwise, add the part's x,y. Pads: shape width x height; smd on the part's side, far side on the other; paste and mask are expansions set on the pad)
"24MHz Crystal" [mm]
  rect 0.88x0.78 smd: 1(-0.64,0.49) 2(0.64,0.49) 3(0.64,-0.49) 4(-0.64,-0.49)
7447797360 [mm]
  rect 3.4x2.4 smd: 1(0,4.1) 2(0,-4.1)
  silkscreen extent -5.1,-5.1 5.1,5.1, body extent -5.1,-5.1 5.1,5.1, height 6.4
*SOIC127P600X175-8N [mm]
  rect 1.65x0.61 smd: 1(-2.63,1.905) 2(-2.63,0.635) 3(-2.63,-0.635) 4(-2.63,-1.905) 5(2.63,-1.905) 6(2.63,-0.635) 7(2.63,0.635) 8(2.63,1.905)
  silkscreen extent -4.38,-2.52 2,2.54
BSZ0909LSATMA1 [mm]
  rect 0.34x0.45 smd mask+0.051: 1(-0.975,-1.675) 2(-0.325,-1.675) 3(0.325,-1.675)
  rect 0.34x0.9 smd mask+0.051: 4(0.975,-1.45)
  rect 0.34x0.65 smd mask+0.051: 5(0.975,1.575) 6(0.325,1.575) 7(-0.325,1.575) 8(-0.975,1.575)
  rect 2.29x1.71 smd mask+0.051: 9(0,0.395)
  rect 1.635x0.45 smd mask+0.051: 10(-0.325,-1.225)
  silkscreen extent -1.65,-2.3 1.65,1.65, body extent -1.7,-1.7 1.7,1.7, height 1.1
C_0402 [mm]
  rrect50% 0.6x0.7 smd mask+0.05: 1(-0.5,0) 2(0.5,0)
  body extent -0.8,-0.4 0.8,0.4, height 0.81
C_0603 [mm]
  rrect50% 0.95x0.9 smd mask+0.05: 1(-0.75,0) 2(0.75,0)
  body extent -0.8,-0.4 0.8,0.4, height 0.81
C_0805 [mm]
  rrect50% 0.91x1.39 smd mask+0.051: 1(-0.82,0) 2(0.82,0)
  body extent -1,-0.63 1,0.63, height 1.35
C_1210 [mm]
  rrect50% 1.635x2.7 smd mask+0.102: 1(0,0) 2(3.035,0)
  body extent -0.24,-1.29 3.16,1.31, height 1.5
"Crystal 32k" [mm]
  rect 1x1.8 smd: 1(-1.25,0) 2(1.25,0)
  silkscreen extent -0.28,-0.91 0.28,0.91, body extent -1.63,-0.75 1.58,0.75, height 0.89
DIOM7859X239N [mm]
  rect 2.3x3.15 smd: 1(-3.35,0) 2(3.35,0)
  silkscreen extent -4.5,-2.95 3.9,2.95, body extent -3.9,-2.95 3.9,2.95, height 2.39
EVRL-0603-2_V [mm] "SMD, 2-Leads, Body 1.6x0.8mm"
  rect 0.8x0.8 smd: 1(-0.75,0) 2(0.75,0)
  silkscreen extent 1.65,-0.4 1.65,0.4, body extent -0.8,-0.4 0.8,0.4, height 0.5
FP-C04-129-MNY-MFG [mm]
  rrect100% 0.85x0.25 smd paste+0 mask+0: 1(-1.45,0.75) 2(-1.45,0.25) 3(-1.45,-0.25) 4(-1.45,-0.75) 5(1.45,-0.75) 6(1.45,-0.25) 7(1.45,0.25) 8(1.45,0.75)
  rect 1.5x1.6 smd paste+0 mask+0: 9(0,0)
  silkscreen extent -2.57,-1.3 1.58,1.3, body extent -1.5,-1 1.5,1, height 0.8
FP-DDC0005A-MFG [mm]
  rect 1.1x0.6 smd paste+0 mask+0: 1(-1.35,0.95) 2(-1.35,0) 3(-1.35,-0.95) 4(1.35,-0.95) 5(1.35,0.95)
  silkscreen extent -2.6,-1.53 0.87,1.53, body extent -1.4,-1.45 1.4,1.45, height 1.1
FP-IHLP-2020CZ-FP_1_905x2-MFG [mm]
  rect 1.905x2.79 smd paste+0 mask+0: 1(-2.425,0) 2(2.425,0)
  silkscreen extent -2.72,-2.72 2.72,2.72, body extent -2.74,-2.59 2.75,2.59, height 3
FP-SOD-123-MFG [mm]
  rect 0.97x0.65 smd paste+0 mask+0: 1(-1.74,0) 2(1.74,0)
  silkscreen extent -3.12,-0.85 1.42,0.85, body extent -1.88,-0.77 1.88,0.77, height 1.45
FP-TFBGA100-A08Q-MFG [mm]
  round 0.4 smd paste+0 mask+0: A1(-3.6,3.6) A2(-2.8,3.6) A3(-2,3.6) A4(-1.2,3.6) A5(-0.4,3.6) A6(0.4,3.6) A7(1.2,3.6) A8(2,3.6) A9(2.8,3.6) A10(3.6,3.6) B1(-3.6,2.8) B2(-2.8,2.8) B3(-2,2.8) B4(-1.2,2.8) B5(-0.4,2.8) B6(0.4,2.8) B7(1.2,2.8) B8(2,2.8) B9(2.8,2.8) B10(3.6,2.8) C1(-3.6,2) C2(-2.8,2) C3(-2,2) C4(-1.2,2) C5(-0.4,2) C6(0.4,2) C7(1.2,2) C8(2,2) C9(2.8,2) C10(3.6,2) D1(-3.6,1.2) D2(-2.8,1.2) D3(-2,1.2) D4(-1.2,1.2) D5(-0.4,1.2) D6(0.4,1.2) D7(1.2,1.2) D8(2,1.2) D9(2.8,1.2) D10(3.6,1.2) E1(-3.6,0.4) E2(-2.8,0.4) E3(-2,0.4) E4(-1.2,0.4) E5(-0.4,0.4) E6(0.4,0.4) E7(1.2,0.4) E8(2,0.4) E9(2.8,0.4) E10(3.6,0.4) F1(-3.6,-0.4) F2(-2.8,-0.4) F3(-2,-0.4) F4(-1.2,-0.4) F5(-0.4,-0.4) F6(0.4,-0.4) F7(1.2,-0.4) F8(2,-0.4) F9(2.8,-0.4) F10(3.6,-0.4) G1(-3.6,-1.2) G2(-2.8,-1.2) G3(-2,-1.2) G4(-1.2,-1.2) G5(-0.4,-1.2) G6(0.4,-1.2) G7(1.2,-1.2) G8(2,-1.2) G9(2.8,-1.2) G10(3.6,-1.2) H1(-3.6,-2) H2(-2.8,-2) H3(-2,-2) H4(-1.2,-2) H5(-0.4,-2) H6(0.4,-2) H7(1.2,-2) H8(2,-2) H9(2.8,-2) H10(3.6,-2) J1(-3.6,-2.8) J2(-2.8,-2.8) J3(-2,-2.8) J4(-1.2,-2.8) J5(-0.4,-2.8) J6(0.4,-2.8) J7(1.2,-2.8) J8(2,-2.8) J9(2.8,-2.8) J10(3.6,-2.8) K1(-3.6,-3.6) K2(-2.8,-3.6) K3(-2,-3.6) K4(-1.2,-3.6) K5(-0.4,-3.6) K6(0.4,-3.6) K7(1.2,-3.6) K8(2,-3.6) K9(2.8,-3.6) K10(3.6,-3.6)
  silkscreen extent -4.87,-4.33 4.33,4.33, body extent -4.57,-4.57 4.57,4.57, height 0.25
iC-TW39 [mm] "24-BIT MAGNETIC ON-AXIS ANGLE SENSOR"
  oval 0.7x0.3 smd mask+0.051: 1(-2.45,1.75) 2(-2.45,1.25) 3(-2.45,0.75) 4(-2.45,0.25) 5(-2.45,-0.25) 6(-2.45,-0.75) 7(-2.45,-1.25) 8(-2.45,-1.75) 17(2.45,-1.75) 18(2.45,-1.25) 19(2.45,-0.75) 20(2.45,-0.25) 21(2.45,0.25) 22(2.45,0.75) 23(2.45,1.25) 24(2.45,1.75)
  oval 0.3x0.7 smd mask+0.051: 9(-1.75,-2.45) 10(-1.25,-2.45) 11(-0.75,-2.45) 12(-0.25,-2.45) 13(0.25,-2.45) 14(0.75,-2.45) 15(1.25,-2.45) 16(1.75,-2.45) 25(1.75,2.45) 26(1.25,2.45) 27(0.75,2.45) 28(0.25,2.45) 29(-0.25,2.45) 30(-0.75,2.45) 31(-1.25,2.45) 32(-1.75,2.45)
  round 0.025 smd mask+0.051: EPAD(-0.003,-0.002)
  silkscreen extent -2.92,2.54 -2.67,2.79, body extent -2.79,-2.79 2.79,2.79, height 0.25
JER2512F2R001L [mm]
  rrect50% 3x3.4 smd: 1(-2.55,0) 2(2.55,0)
  silkscreen extent -4.32,-2.03 4.32,2.03
"JST 4 PIN 1.5" [mm]
  round 1.2 hole 0.7: 1(-2.3,-1.5) 2(-0.8,-1.5) 3(0.7,-1.5) 4(2.2,-1.5)
  silkscreen extent -3.8,-2.5 3.7,1
ONSC-SOD-123FL-2-498-01_V [mm] "SOD, 2-Leads, Body 2.7x1.65mm"
  rect 0.91x1.22 smd: 1(-1.635,0) 2(1.635,0)
  silkscreen extent -1.76,-0.82 0.78,1.28, body extent -1.35,-0.82 1.35,0.82, height 1
R_0402 [mm]
  rrect50% 0.6x0.7 smd mask+0.051: 1(-0.5,0) 2(0.5,0)
  body extent -0.8,-0.4 0.8,0.4, height 0.81
R_0603 [mm]
  rrect50% 0.95x0.9 smd mask+0.051: 1(-0.75,0) 2(0.75,0)
  body extent -0.8,-0.4 0.8,0.4, height 0.47
SOIC127P600X170-9N [mm]
  rect 1.525x0.65 smd: 1(-2.712,1.905) 2(-2.712,0.635) 3(-2.712,-0.635) 4(-2.712,-1.905) 5(2.712,-1.905) 6(2.712,-0.635) 7(2.712,0.635) 8(2.712,1.905)
  rect 2.4x3.1 smd: 9(0,0)
  silkscreen extent -3.47,2.58 -1.95,2.58, body extent -3,-2.45 3,2.45, height 1.57
SOT65P280X110-8N [mm]
  rect 1.37x0.48 smd: 1(-1.15,0.975) 2(-1.15,0.325) 3(-1.15,-0.325) 4(-1.15,-0.975) 5(1.15,-0.975) 6(1.15,-0.325) 7(1.15,0.325) 8(1.15,0.975)
  silkscreen extent -2.52,-1.45 0.1,1.45
SOT95P280X110-6N [mm] "SOT23, 6-Leads, Body 2.90x2.80mm, Pitch 0.95mm, IPC Medium Density"
  rect 1x0.6 smd: 1(-1.375,0.95) 2(-1.375,0) 3(-1.375,-0.95) 4(1.375,-0.95) 5(1.375,0) 6(1.375,0.95)
  silkscreen extent -1.5,-1.55 0.5,1.92, body extent -0.88,-1.52 0.87,1.53, height 1.1
Texas_Instruments_PW0016A_MFG [mm]
  rrect22% 1.5x0.45 smd paste+0 mask+0: 1(-2.9,2.275) 2(-2.9,1.625) 3(-2.9,0.975) 4(-2.9,0.325) 5(-2.9,-0.325) 6(-2.9,-0.975) 7(-2.9,-1.625) 8(-2.9,-2.275) 9(2.9,-2.275) 10(2.9,-1.625) 11(2.9,-0.975) 12(2.9,-0.325) 13(2.9,0.325) 14(2.9,0.975) 15(2.9,1.625) 16(2.9,2.275)
  silkscreen extent -4.37,-2.55 1.78,2.55, body extent -3.75,-2.8 3.75,2.8, height 0.25
TPS51200MDRCTEP [mm]
  rect 0.6x0.24 smd mask+0.05: 1(-1.4,1) 2(-1.4,0.5) 3(-1.4,0) 4(-1.4,-0.5) 5(-1.4,-1) 6(1.4,-1) 7(1.4,-0.5) 8(1.4,0) 9(1.4,0.5) 10(1.4,1)
  rect 1.65x2.4 smd mask+0.05: 11(0,0)
  rect 0.25x0.5 smd mask+0.05: 12(-0.25,1.45) 13(-0.25,-1.45) 14(0.25,-1.45) 15(0.25,1.45)
  silkscreen extent -2.2,0.95 -2.1,1.05, body extent -1.5,-1.5 1.5,1.5, height 1

## Part data
C1 C2 C3 C4 C5 C6 C7 C8 C9 C10 C11 C12 C13 C14 C15 C42 C43 C44 C72 C73 C74 C75 C76 C77: library part C_0805
C16 C17 C18 C19 C20 C21 C22 C23 C24 C39 C40 C41 C46 C47 C48 C49 C50 C51 C52 C56: library part C_0603
C25 C26 C27 C28 C29 C30 C31 C32 C33 C34 C35 C36 C37 C38 C45 C53 C54 C55 C57 C58 C59 C60 C61 C62 C63 C64 C65 C66 C69 C70 C71: library part C_0402
C67 C68: library part C_1210
D1 D2 D3: library part CMP-12187-000006-1, "DIODE SCHOTTKY 100V 150MA SOD123", Capacitance=10pF, Forward Current=150mA, Manufacturer=STMicroelectronics, Max Junction Temp=+150°C, Max Repetitive Reverse Voltage=100V, Max Surge Forward Current=1A, Package=SOD-123, Peak Reverse Current=5uA, Temperature="to +150°C", Automotive=No, Category=Diode, ComponentLink2Description=Datasheet, ComponentLink2URL=https://www.st.com/resource/en/datasheet/bat46.pdf, Device Class L1="Discrete Semiconductors", Device Class L2=Diodes, Device Class L3="Schottky Diodes", Digikey Description="DIODE SCHOTTKY 100V 150MA SOD123", Height=1.45mm, Ipc Land Pattern Name=SOD375155X145-2, Lead Free=Yes, Manufacturer Part Number=BAT46ZFILM, Mouser Description="Schottky Diodes & Rectifiers schottky diode", Octopart=https://octopart.com/bat46zfilm-stmicroelectronics-658190, RoHS=TRUE, Standoff Height=0mm, Temperature Range High=+150°C
D4: "Schottky Diode", Manufacturer_Name="Comchip Technology", Mouser Part Number=750-SS56C-HF, Arrow Part Number=SS56C-HF, Arrow Price/Stock=https://www.arrow.com/en/products/ss56c-hf/comchip-technology?region=nac, Datasheet Link=https://www.comchiptech.com/admin/files/product/20190806171902.pdf, Height=2.39mm, Manufacturer_Part_Number=SS56C-HF, Mouser Price/Stock=https://www.mouser.co.uk/ProductDetail/Comchip-Technology/SS56C-HF?qs=GBLSl2AkirseVC5DPICxbA%3D%3D, Parameter 1=B560C-13-F, Parameter 2=C85100
D5: library part CMP-1055-00439-1, "Schottky Power Rectifier, 2-Pin SOD-123, Pb-Free, Tape and Reel", Manufacturer="On Semiconductor", ComponentLink1Description="Manufacturer URL", ComponentLink1URL=http://www.onsemi.com/, ComponentLink2Description=Datasheet, ComponentLink2URL=http://www.onsemi.cn/pub_link/Collateral/MBR1H100SF-D.PDF, ComponentLink3Description="Package Specification", ComponentLink3URL=http://www.onsemi.cn/pub_link/Collateral/MBR120VLSFT1-D.PDF, Configuration=Single, DatasheetVersion="Rev. 1", IFSM Max (A)=50, Mounting Technology="Surface Mount", PackageDescription="2-Pin SOD, Body 1.65 x 2.7 mm", PackageReference=SOD-123FL-2-498-01, PackageVersion="Rev. A", Packing="Tape and Reel", PartNumber=MBR1H100SFT3G, RoHS=TRUE
DS1 DS2 DS3 DS4 DS5 DS6: library part CMP-007-00002-2, "Chip LED, Yellow-Green, 5 V, 25 mA, -40 to 85 degC, 2-Pin SMD (0603), RoHS, Tape and Reel", Case/Package=0603, Colour=Green, Forward Voltage=2V, Manufacturer="Everlight Electronics", Package Description="2-Pin Surface Mount Device, Body 1.6 x 0.8 mm", Datasheet URL=https://datasheet.ciiva.com/48679/19-217-g7c-an1p2-3t-48679179.pdf, Datasheet Version="Rev. 1, 04/2006", Lens Style=Clear, Manufacturer URL=http://www.everlight.com/, Mounting Technology=SM, Package Reference=0603, Pins=2, RoHS Compliant=True, Viewing Angle=120degrees
  DS1: Parameter 1=XL-1608SURC-06, Parameter 2=C965799
IC0: "Integrated Circuit", Manufacturer_Name="Texas Instruments", Mouser Part Number=595-TPS54560DDA, Arrow Part Number=TPS54560DDA, Arrow Price/Stock=https://www.arrow.com/en/products/tps54560dda/texas-instruments?utm_currency=USD&region=nac, Datasheet Link=http://www.ti.com/lit/ds/symlink/tps54560.pdf, Height=1.7mm, Manufacturer_Part_Number=TPS54560DDA, Mouser Price/Stock=https://www.mouser.co.uk/ProductDetail/Texas-Instruments/TPS54560DDA?qs=%2FA2SZCkL4TkCDiLMkQe1zw%3D%3D, Parameter 1=TPS54560DDA, Parameter 2=C7420431, Parameter 3=C31966
IC1 IC2 IC3: "Integrated Circuit", Manufacturer_Name="Texas Instruments", Mouser Part Number=595-UCC27289DRCR, Datasheet Link=https://www.ti.com/lit/ds/symlink/ucc27289.pdf?ts=1715220331720&ref_url=https%253A%252F%252Fwww.mouser.tw%252F, Height=1mm, Manufacturer_Part_Number=UCC27289DRCR, Mouser Price/Stock=https://www.mouser.co.uk/ProductDetail/Texas-Instruments/UCC27289DRCR?qs=rQFj71Wb1eUTx1xsT8GKBg%3D%3D
L2: library part CMP-02424-000144-1, "Fixed Inductors Commercial High Saturation Series 15uH 1.9A 265mΩ 20%", Case/Package=2020, Current Rating=1.9A, DC Resistance (DCR)=265mR, Max DC Current=2.5A, Max Operating Temperature=125°C, Min Operating Temperature=-55°C, Package Quantity=2000, Self Resonant Frequency=5MHz, Test Frequency=100kHz, Tolerance=20%, Core Material=Metal, Depth=5.43mm, Height=3mm, Height - Seated (Max)=0.118inch, Inductance=15uH, Lead Free="Lead Free", Length=5.49mm, Military Standard=Not, Mount="Surface Mount", Packaging="Tape and Reel", Radiation Hardening=No, Saturation Current=2.5A, Shielding=Shielded, Termination=SMD/SMT, Width=0.204inch
L3: "Inductor", Manufacturer_Name="Wurth Elektronik", Mouser Part Number=710-7447798720, Height=4.5mm, Manufacturer_Part_Number=7447798720, Mouser Price/Stock=https://www.mouser.co.uk/ProductDetail/Wurth-Elektronik/7447798720?qs=E%2F%2FhvbtCqpOcNhO9pFvFww%3D%3D
Q1 Q2 Q3 Q4 Q5 Q6 Q7 Q8 Q9 Q10 Q11 Q12: "MOSFET (N-Channel)", Manufacturer_Name=Infineon, Mouser Part Number=726-BSZ075N08NS5ATMA, Arrow Part Number=BSZ075N08NS5ATMA1, Arrow Price/Stock=https://www.arrow.com/en/products/bsz075n08ns5atma1/infineon-technologies-ag?utm_currency=USD&region=nac, Datasheet Link=https://www.infineon.com/dgdl/Infineon-BSZ075N08NS5-DataSheet-v02_03-EN.pdf?fileId=5546d461454603990145ccd5743e61f8, Height=1mm, Manufacturer_Part_Number=BSZ075N08NS5ATMA1, Mouser Price/Stock=https://www.mouser.co.uk/ProductDetail/Infineon-Technologies/BSZ075N08NS5ATMA1?qs=3Bi3m9r5MQbCecwbz%252BCetA%3D%3D
R1 R2 R3 R4 R5 R6 R7 R8 R9 R10 R11 R12 R16 R17 R18 R19 R20 R21 R22 R24 R25 R26 R27 R28 R29 R30 R31 R32 R33 R34 R35 R36 R37 R39 R40 R41 R42 R43 R44 R45 R46 R47 R48 R49 R50 R51 R52 R53 R54 R55 R56 R57 R58 R59 R60 R61: library part R_0402
R13 R14 R15: "RES 1mΩ ±1% 2W 2512", LCSC Part No=C49164682, Manufacturer Part No="JIERR JER2512F2R001L"
R23 R38: library part R_0603
U1 U3 U4: "-5-V to 110-V bidirectional ultraprecise current sense amplifier with enhanced PWM rejection", Package=None, Availability="In Stock", Check_prices=https://www.snapeda.com/parts/INA241A3IDDFR/Texas+Instruments/view-part/?ref=eda, MF="Texas Instruments", MP=INA241A3IDDFR, Price=None, Purchase-URL=https://pricing.snapeda.com/search?q=INA241A3IDDFR&ref=eda, SnapEDA_Link=https://www.snapeda.com/parts/INA241A3IDDFR/Texas+Instruments/view-part/?ref=snap
U2: library part CMP-04916-000008-1, "IC VREF SERIES 1.65V/3.3V 5SOT", Manufacturer="Texas Instruments", Max Junction Temp=+150°C, Max Supply Voltage=5.5V, Min Supply Voltage=3.32V, Nominal Supply Current=360uA, Output Current=20mA, Output Voltage=1.65/3.3V, Package=DDC0005A, Temperature="-40°C to +125°C", Temperature Range High=+125°C, Temperature Range Low=-40°C, Automotive=No, Category=IC, ComponentLink2Description=Datasheet, ComponentLink2URL=http://www.ti.com/lit/ds/symlink/ref2033.pdf, Device Class L1="Integrated Circuits (ICs)", Device Class L2="Power Management ICs", Device Class L3="Voltage References", Digikey Description="IC VREF SERIES 1.65V/3.3V 5SOT", Height=1.1mm, Lead Free=Yes, Manufacturer Part Number=REF2033AIDDCR, Number of Outputs=2, Octopart=https://octopart.com/ref2033aiddcr-texas+instruments-46921199, Output Type=Fixed, Reference Type=Series, RoHS=TRUE, Standoff Height=0mm
U6: library part CMP-12105-000111-1, "IC MCU 32BIT 512KB FLSH 100TFBGA", RoHS Compliant=Yes
U7: library part CMP-2000-07336-2, Ambient Temperature Range High=85°C, Case/Package=TSSOP, High Level Output Current=-20µA, Low Level Output Current=20µA, Manufacturer Lifecycle Status=ACTIVE, Max Junction Temperature (Tj)=150°C, Max Supply Voltage=5.5V, Min Operating Temperature=-40°C, Min Supply Voltage=1.2V, Quiescent Current=3.5µA, Contact Plating=Gold, Data Rate=100Mbps, Height=1.2mm, Lead Free="Lead Free", Length=5mm, Lifecycle Status=Production, Logic Function=Translator, Max Operating Temperature=85°C, Min Supply Voltage (DC)=1.2V, Mount="Surface Mount", NexarPartId=9437508, Number of Bits=6, Number of Channels=6, Number of Circuits=1, Number of Inputs=6, Number of Outputs=6, Number of Pins=16, Number of Transceivers=6, Output Current=20µA, Packaging="Cut Tape (CT)", Propagation Delay=4ns, Radiation Hardening=No, REACH SVHC="No SVHC", RoHS=Compliant, Schedule B="8542390000, 8542390000", Termination=SMD/SMT, Thickness=1mm, Turn-On Delay Time=9.5ns, Weight=61.887009mg, Width=4.4mm
U8: library part CMP-06279-000053-1, "IC TRANSCEIVER 1/1 8TDFN", Max Operating Temperature=150°C, Min Operating Temperature=-40°C, Data Rate=8Mbps, Mount="Surface Mount", Packaging="Cut Tape", Receiver Hysteresis=200mV, RoHS Compliant=Yes, Series=-
X1: library part "24MHz Crystal"
U10: Check_prices=https://www.snapeda.com/parts/MC33269D-3.3G/Onsemi/view-part/?ref=eda, SnapEDA_Link=https://www.snapeda.com/parts/MC33269D-3.3G/Onsemi/view-part/?ref=snap

## Via types
v1: diameter 0.45, hole 0.2, Signal 1 to Signal 3, tented both sides, 210 vias
v2: diameter 0.4, hole 0.2, Signal 1 to Signal 3, tented both sides, 204 vias
v3: diameter 0.45, hole 0.2, Signal 1 to GND1, tented both sides, 168 vias
v4: diameter 0.45, hole 0.2, GND2 to Signal 3, tented both sides, 127 vias
v5: diameter 0.4, hole 0.2, Signal 1 to GND1, tented both sides, 114 vias
v6: diameter 0.4, hole 0.2, Signal 2 to Power, tented both sides, 113 vias
v7: diameter 0.4, hole 0.2, Power to GND2, tented both sides, 100 vias
v8: diameter 0.4, hole 0.2, GND2 to Signal 3, tented both sides, 99 vias
v9: diameter 0.4, hole 0.2, GND1 to Signal 2, tented both sides, 66 vias
v10: diameter 0.4, hole 0.15, Signal 1 to GND1, tented both sides, 62 vias
v11: diameter 0.4, hole 0.15, GND1 to Signal 2, tented both sides, 49 vias
v12: diameter 0.45, hole 0.2, GND1 to Signal 2, tented both sides, 29 vias
v13: diameter 0.5, hole 0.2, Signal 1 to GND1, tented both sides, 25 vias
v14: diameter 0.5/0.5 (per signal layer), hole 0.2, GND2 to Signal 3, tented both sides, 24 vias
v15: diameter 0.45, hole 0.2, Signal 2 to Power, tented both sides, 11 vias
v16: diameter 0.4, hole 0.15, Signal 1 to Signal 3, tented both sides, 9 vias
v17: diameter 0.5, hole 0.2, Signal 1 to Signal 3, 4 vias
v18: diameter 0.5, hole 0.3, Signal 1 to Signal 3, tented both sides, 4 vias
v19: diameter 0.4, hole 0.15, GND2 to Signal 3, tented both sides, 3 vias
v20: diameter 0.3, hole 0.15, Signal 1 to Signal 3, tented both sides, 3 vias
v21: diameter 0.5/0.5 (per signal layer), hole 0.2, GND1 to Signal 2, tented both sides, 2 vias
v22: diameter 0.4, hole 0.2, Signal 1 to Signal 3, 2 vias
v23: diameter 0.4, hole 0.15, Power to GND2, tented both sides, 2 vias
v24: diameter 0.33, hole 0.15, Signal 1 to Signal 3, tented both sides, 2 vias
v25: diameter 0.35, hole 0.15, GND1 to Signal 2, tented both sides, 2 vias
v26: diameter 0.5/0.5 (per signal layer), hole 0.2, Signal 1 to GND1, tented both sides, 1 vias
v27: diameter 0.4, hole 0.2, GND1 to Signal 2, 1 vias
v28: diameter 0.4, hole 0.2, Signal 1 to GND1, 1 vias

## Nets (pads, with @x,y where several pads share a name; then routed paths per layer and width w, separated by ;. In a path a pad name is that pad's centre, name@x,y a point inside that pad or via, vN(x,y) a via of type N, cw(c..) or ccw(c..) an arc to the next point about the centre after c; other vN are vias at no path point)
+1.65V: C16.1 C19.1 C21.1 C23.1 U1.7 U2.1 U3.7 U4.7 | length 58.3
  Signal 1 w0.138: v2@93.64,62.892 93.64,62.695 93.909,62.426 U1.7@93.909,61.221 ; v2(103.206,60.658) 103.326,60.658 103.815,60.169 U3.7@103.815,59.074 ; v2(113.198,63.085) 113.244,63.085 113.848,62.482 U4.7@113.848,61.229
  Signal 3 w0.5: C16.1@93.499,61.435 93.594,61.66 93.594,62.817 93.822,63.044 95.603,63.044 96.041,62.606 ccw(c96.881,62.606) 96.881,61.766 104.619,61.766 ; C23.1@103.124,59.436 103.177,59.661 103.177,60.666 104.619,61.766 ; C21.1@113.198,61.951 113.198,63.115 cw(c114.43,63.115) 114.43,64.348 ; U2.1@117,82.25 116.95,82.3 115.775,82.3 C19.1@115.625,82.45 115.625,81.758 ccw(c116.721,81.758) 116.721,80.662 cw(c116.721,79.827) 117.556,79.827 117.556,75.484 cw(c116.506,75.484) 116.506,74.434 ccw(c116.506,73.584) 115.656,73.584 115.656,72.55 115.625,65.544 ccw(c116.125,65.542) 115.625,65.542 cw(c114.43,65.542) 114.43,64.348 ; 104.619,61.766 105.814,61.766 ccw(c105.814,64.306) 107.61,62.51 108.704,63.604 cw(c110.5,61.808) 110.5,64.348 114.43,64.348
  other v2: 93.64,62.794
+3.3V: C17.1 C22.1 C24.1 C26.1 C27.2 C28.2 C29.1 C30.2 C31.1 C32.1 C33.1 C34.1 C43.1 C44.1 C59.1 C61.2 C62.2 C63.2 C64.2 R22.2 R25.2 R39.1 R40.1 R45.1 R46.2 U1.6 U3.6 U4.6 U6.D3 U6.D5 U6.D7 U6.F5 U6.F7 U6.J5 U7.2 U9.5 U9.14 U9.17 U9.24 U9.27 U10.2 U10.3 U10.6 U10.7 | length 63.4
  Signal 1 w0.138: U1.6@94.57,61.232 v3(94.57,62.446) ; U6.D3@98.047,94.5 v25(98.424,94.877) ; v19(99.27,90.123) U6.J5@99.647,90.5 ; U6.F5@99.647,92.9 v10(100.024,93.277) ; U6.D5@99.647,94.5 v10(100.024,94.877) ; U6.F7@101.247,92.9 v10(101.624,93.277) ; U6.D7@101.247,94.5 101.258,94.5 v10@101.636,94.877 ; U3.6@104.465,59.074 v3(104.465,60.288) ; U4.6@114.498,61.229 v3(114.498,62.57)
  Signal 1 w0.254: C62.2@98.067,74.867 C62.2@98.1,74.833 ; C61.2@99.204,74.83 C61.2@99.207,74.833
  Signal 1 w0.3: v5(121.412,87.9) R25.2@122.1,87.9
  Signal 1 w0.4: C62.2@98.1,74.833 C61.2@99.207,74.833 ; v3(98.247,79.248) 98.256,79.258 99.038,79.258 C63.2@99.073,79.292 ; C64.2@101.4,76.8 102.13,76.8 102.165,76.835 v12(102.179,76.835) ; v2(119.95,72.2) 120.924,72.2 ccw(c120.924,72.401) 121.125,72.401 U7.2@121.125,74.3
  GND1 w0.127: v10(101.624,93.277) v11@101.664,93.277
  Signal 2 w0.3: v6(94.57,61.839) v3(94.57,62.446) ; v6(96.41,94.463) v6(97.21,94.463) ; v15(98.424,94.123) v25(98.424,94.877) 98.434,94.887 98.784,94.887 99.197,95.3 v6(99.224,95.3) ; v6(99.154,93.5) 99.181,93.5 99.399,93.281 100.021,93.281 v10(100.024,93.277) ; v15(100.024,92.5) v10(100.024,93.277) ; v6(101.592,88.421) 101.619,88.421 101.904,88.706 102.113,88.706 v6(102.132,88.725) ; v10(101.624,93.277) 101.624,92.526 ccw(c101.65,92.526) v15(101.65,92.5) ; v10(101.624,94.877) v15(100.824,94.877) v10(100.024,94.877) v15(100.024,94.077) v10(100.024,93.277) ; v6(102.833,90.61) v6(102.834,91.301) ; v3(104.465,60.288) v15(104.465,60.96) ; v3(114.498,62.57) v15(114.498,63.119)
  Signal 2 w0.4: v6(97.67,90.757) v6(98.507,90.757) ; v15(98.247,78.613) v3(98.247,79.248) ; v6(98.507,92.017) v6(98.507,90.757) ; v15(98.642,74.132) v3(98.642,74.839) ; v19(99.27,90.123) 99.27,90.754 v15(99.273,90.757) v6(98.507,90.757) ; v15(102.171,76.168) 102.179,76.168 v12(102.179,76.835) ; v6(121.412,87.249) v5(121.412,87.9)
  Signal 3 w0.254: C28.2@96.423,95.399 v8(97.011,95.399) R46.2@97.6,95.4 97.662,95.4 98.176,94.886 v7(98.302,94.886) 98.427,94.886 98.436,94.877 98.448,94.877 98.667,94.659 99.041,94.659 C34.1@99.2,94.5 ; v8(96.7,79.7) v8(97.4,80.4) 99.095,80.4 99.288,80.206 99.288,79.646 U9.27@99.297,79.637 ; v8(96.83,78.937) U9.24@97.597,78.937 ; v8(97.17,74.9) 97.17,75.198 97.409,75.437 U9.17@97.597,75.437 ; C29.1@97.891,90.123 v19@99.249,90.123 ; v19@99.265,90.118 v7(99.9,89.484) C30.2@99.9,88.5 ; v8@101.647,94.89 101.647,95.924 C31.1@101.715,95.992 ; U9.5@102.497,76.937 102.506,76.928 v8(103.472,76.928) v8@103.5,76.9
  Signal 3 w0.3: R45.1@95.869,80.533 v8(95.869,81.287) ; v7(99.297,73.998) U9.14@99.297,74.737 ; C33.1@99.561,91.99 99.561,92.803 v19(100.036,93.277) v7(101.644,93.277) v7(102.424,93.277) 102.833,92.869 C32.1@102.833,92 ; C30.2@99.9,88.5 v8(100.802,88.5) 101.262,88.96 101.3,88.96 101.565,89.225 v8(101.592,89.225) C27.2@101.592,89.916 ; C27.2@101.64,90.088 101.67,90.118 v7(101.67,90.544) 101.67,90.97 C26.1@101.7,91 101.75,91 102.591,91.841 102.624,91.841 C32.1@102.783,92 ; R40.1@105.369,75.587 v8(106.152,75.587) ; R39.1@105.398,76.831 v8(106.152,76.831)
  Signal 3 w0.4: C17.1@94.969,61.435 v8(95.873,61.435) ; C24.1@104.394,59.436 v8(105.298,59.436) ; C22.1@114.5,61.95 v8(115.404,61.95) ; R22.2@118.3,72.2 v2(118.844,72.2) v2(119.4,72.2) v2(119.95,72.2) C59.1@120.5,72.2
  other v3: 102.179,76.835
  other v5: 117.765,81.544 118.379,81.54 119.035,81.544 118.406,82.931 117.765,84.201 118.406,84.201 119.035,84.249 118.4,86.968 119.035,86.965 117.765,86.995 118.4,88.22 117.765,89.305 118.4,89.305 119.035,89.305
  other v6: 117.765,82.388 119.035,82.388 117.765,83.6 119.035,83.595 118.405,87.669 117.777,87.899 119.035,87.9 117.765,88.646 119.035,88.646 118.395,88.771
  other v7: 105.298,59.436 95.873,61.435 115.404,61.95 97.17,74.9 106.152,75.587 106.152,76.831 103.472,76.928 96.83,78.937 96.7,79.7 97.4,80.4 95.869,81.287 100.802,88.5 101.592,89.225 118.469,89.65 117.877,90.25 118.469,90.25 119.06,90.25 100.723,93.28 97.011,95.399
  other v8: 99.297,73.998 99.9,89.484 118.469,89.65 117.877,90.25 118.469,90.25 119.06,90.25 101.67,90.544 101.644,93.277 102.424,93.277 101.647,94.877 98.302,94.886
  other v9: 117.765,81.544 118.379,81.54 119.035,81.544 118.406,82.931 117.765,84.201 118.406,84.201 119.035,84.249 118.4,86.968 119.035,86.965 117.765,86.995 121.412,87.9 118.4,88.22 117.765,89.305 118.4,89.305 119.035,89.305 99.27,90.123 101.624,94.877
  other v10: 99.27,90.123 98.424,94.877
  other v11: 100.024,93.277 101.624,93.277 100.024,94.877
  other v12: 104.465,60.288 94.57,62.446 114.498,62.57 98.642,74.839 98.247,79.248
  other v19: 100.723,93.28
  other v23: 100.036,93.277 101.647,94.877
+5V: C18.1 C42.1 C54.1 C60.2 J1.1 L2.2 R27.1 R29.2 U2.3 U2.4 U7.15 U8.3 U10.4 | length 103.3
  Signal 1 w0.2: J1.1@97.8,99.6 97.8,98.8 99.1,97.5 v2(102.971,97.5)
  Signal 1 w0.5: L2.2@115.925,93.8 115.925,91.146 116.495,90.576 U10.4@116.495,88.23 116.485,88.22 C42.1@114.7,88.22 113.495,88.22 ccw(c113.495,87.838) 113.112,87.838 113.112,82.981 ccw(c115.431,82.981) 115.431,80.662 122.004,80.662 cw(c122.004,79.426) 123.241,79.426 123.19,77.187 123.19,70.993 cw(c122.822,70.993) 122.822,70.625 v2(122.386,70.625) 121.951,70.625 ccw(c121.951,69.8) 121.125,69.8 U7.15@121.125,68.5
  Signal 2 w0.4: J1.1@97.8,99.6 cw(c99.165,99.6) 99.165,100.965 107.609,100.965 109.864,98.952 110.173,98.643 111.09,97.484 111.324,97.25 114.45,97.25 cw(c114.45,96.257) 115.443,96.257 115.443,95.631 ccw(c115.879,95.631) 115.879,95.195 v2(115.99,95.195) ccw(c116.009,95.195) 116.009,95.176 v2(116.586,95.176) 116.873,95.176 cw(c116.873,94.95) v2(117.1,94.95)
  Signal 3 w0.2: v2(102.971,97.5) U8.3@105.8,97.5
  Signal 3 w0.3: R27.1@113.1,86.7 113.112,86.7 113.112,85.85 ccw(c113.337,85.85) 113.337,85.625 115.875,85.625 116.176,85.324 116.176,84.724 116.75,84.15 U2.3@117,84.15
  Signal 3 w0.5: v2(115.99,95.195) 116.374,95.195 cw(c116.374,94) 117.569,94 ; C54.1@116.1,91.3 116.1,91.843 cw(c116.586,91.843) 116.586,92.329 ; U2.3@117,84.15 U2.4@119.7,84.15 cw(c119.7,84.675) 119.175,84.675 C18.1@119.175,85.4 121.15,85.4 ccw(c121.15,85.85) 121.6,85.85 121.6,89.789 ccw(c119.06,89.789) 119.06,92.329 116.586,92.329 ; R29.2@118.8,94 117.569,94 ; C60.2@121.5,70.2 cw(c121.936,70.2) 121.936,70.636 v2(122.91,70.636) ; 116.586,92.329 ccw(c116.586,92.721) 116.978,92.721 116.978,93.409 cw(c117.569,93.409) 117.569,94